# Altium PCB Copy of PCB.PcbDoc (part 1 of 5)
Units mm, origin at the board's own origin, x right, y up, seen from the top; angles counter-clockwise.
Board outline 130 x 115.04 mm, 6 copper layers (Top Layer, Int1 (GND), Int2, Int3 (PWR), Int4 (GND), Bottom Layer), stack 1.647 mm thick; 306 components, 246 nets, 1107 pads, 360 vias.
Unrouted connection lines stored in the file: 123.
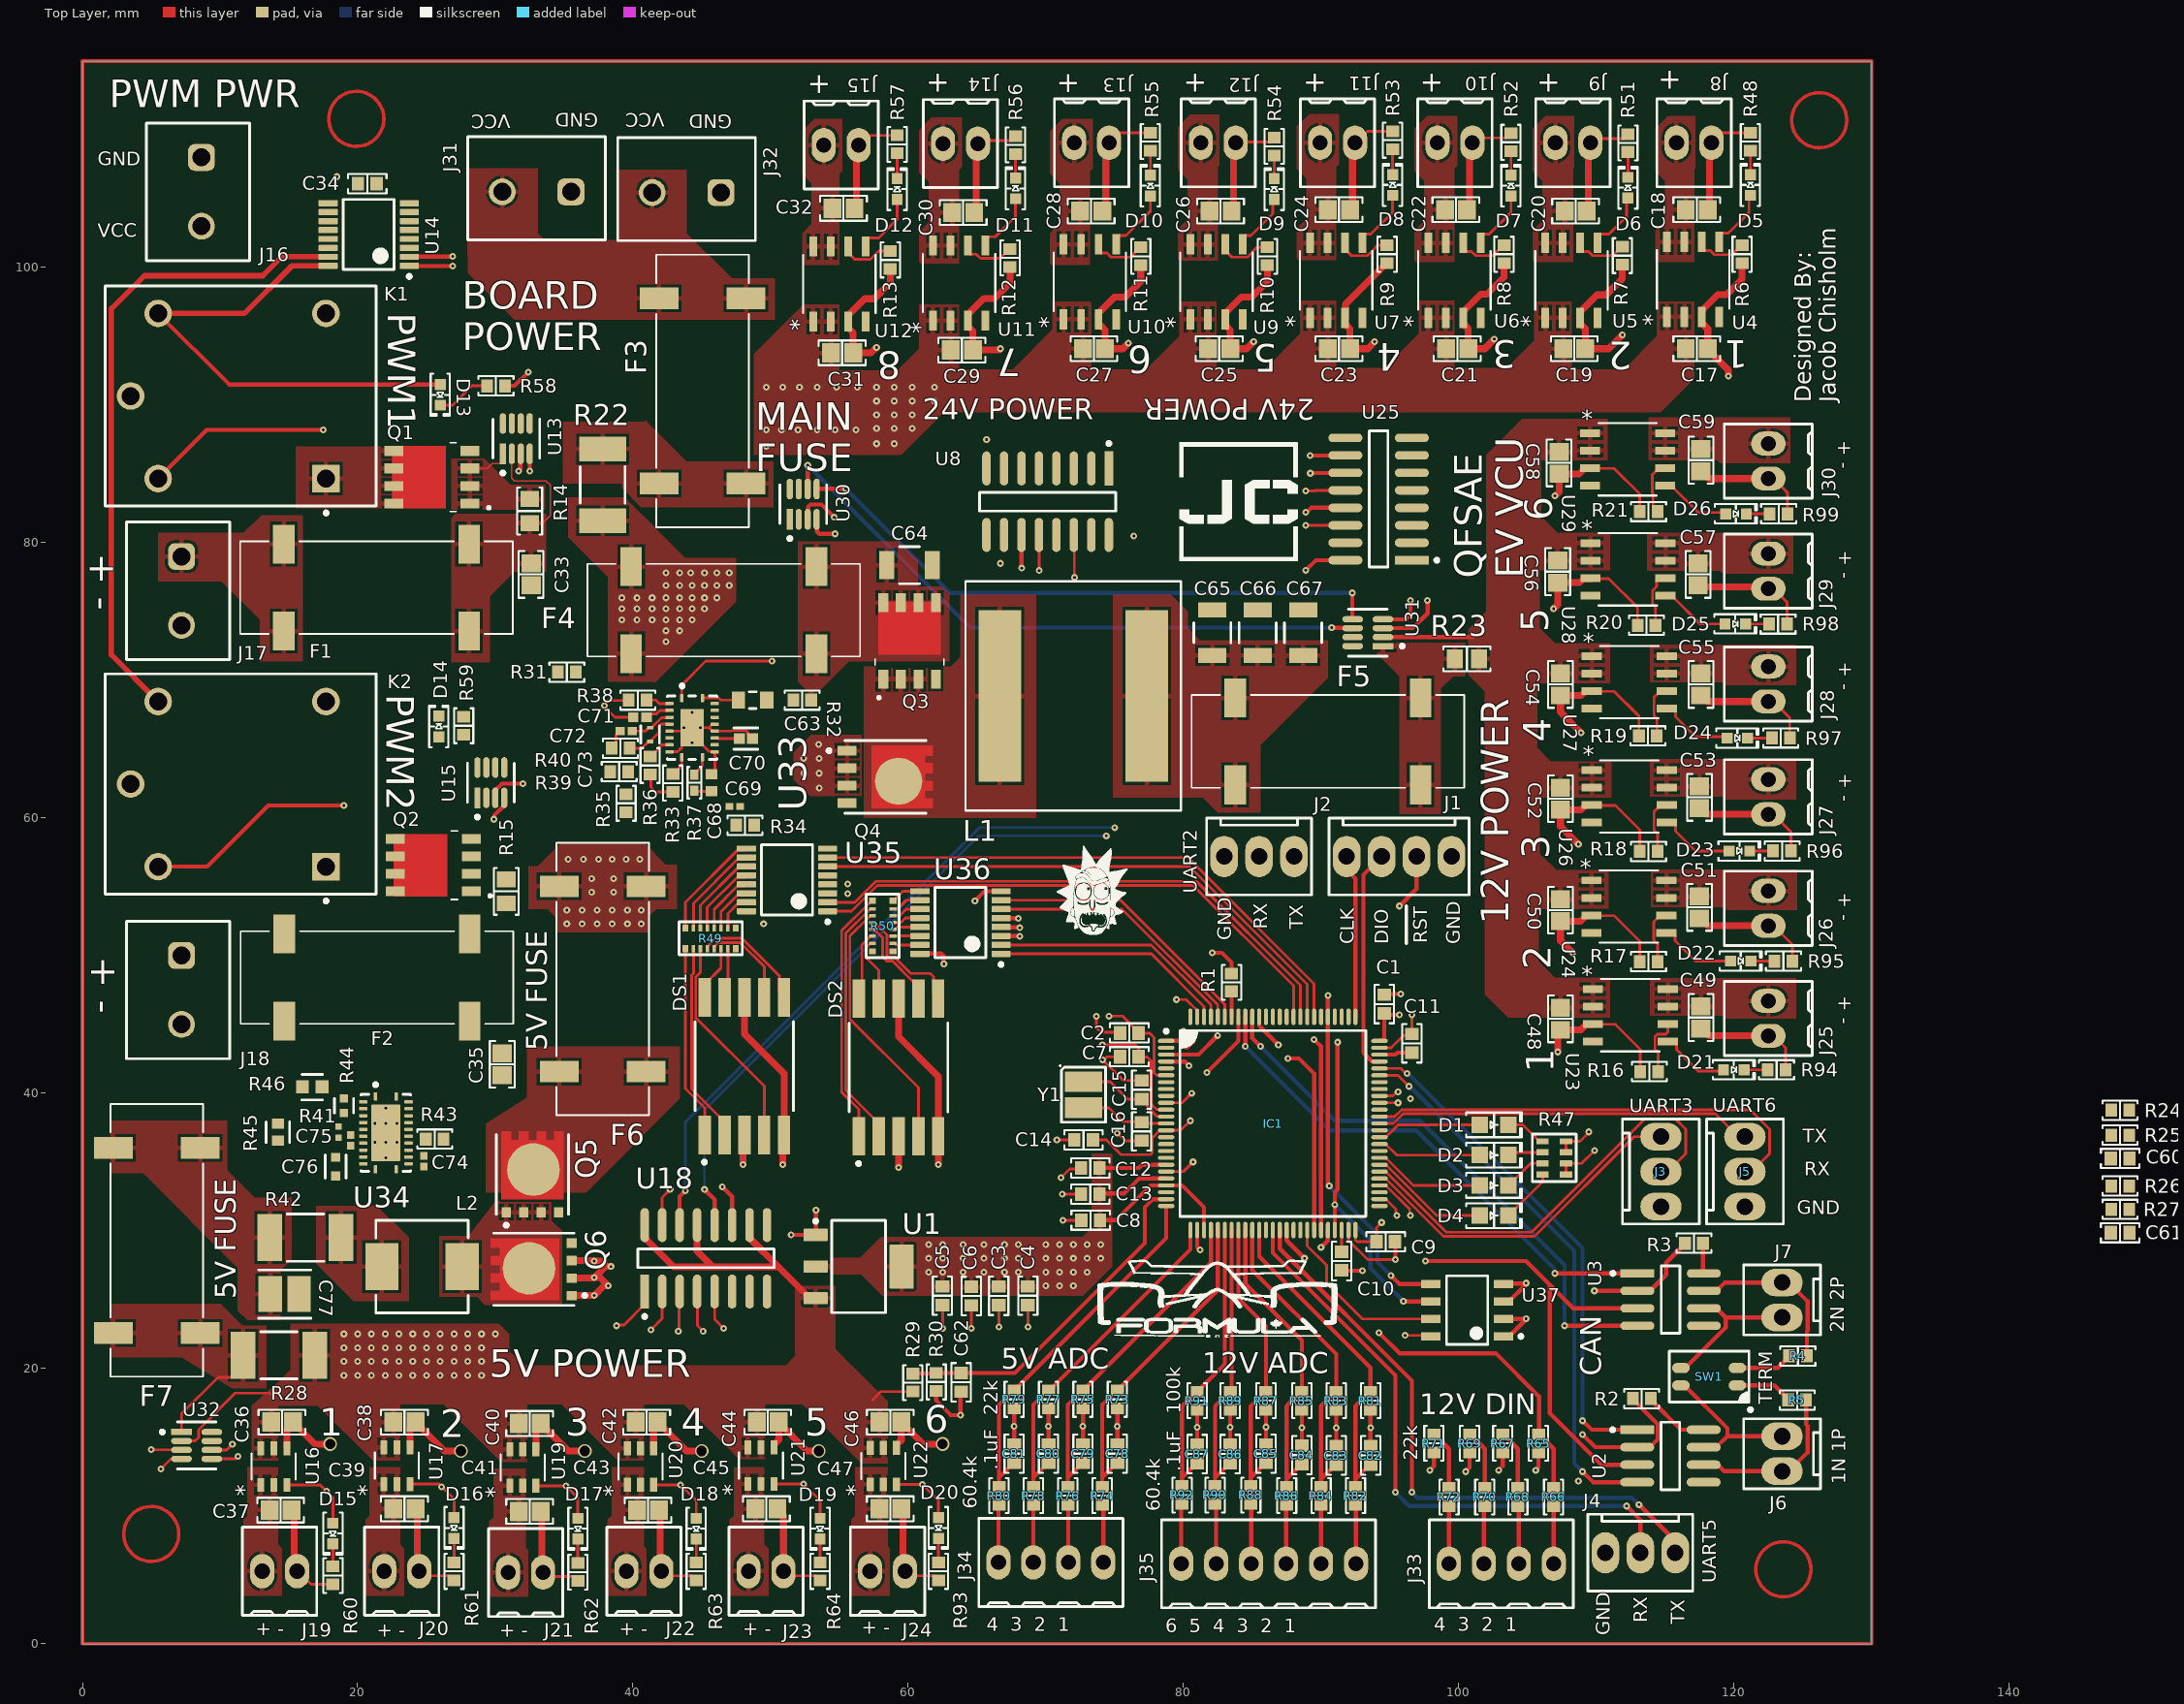
[diagram p0: Top Layer view]
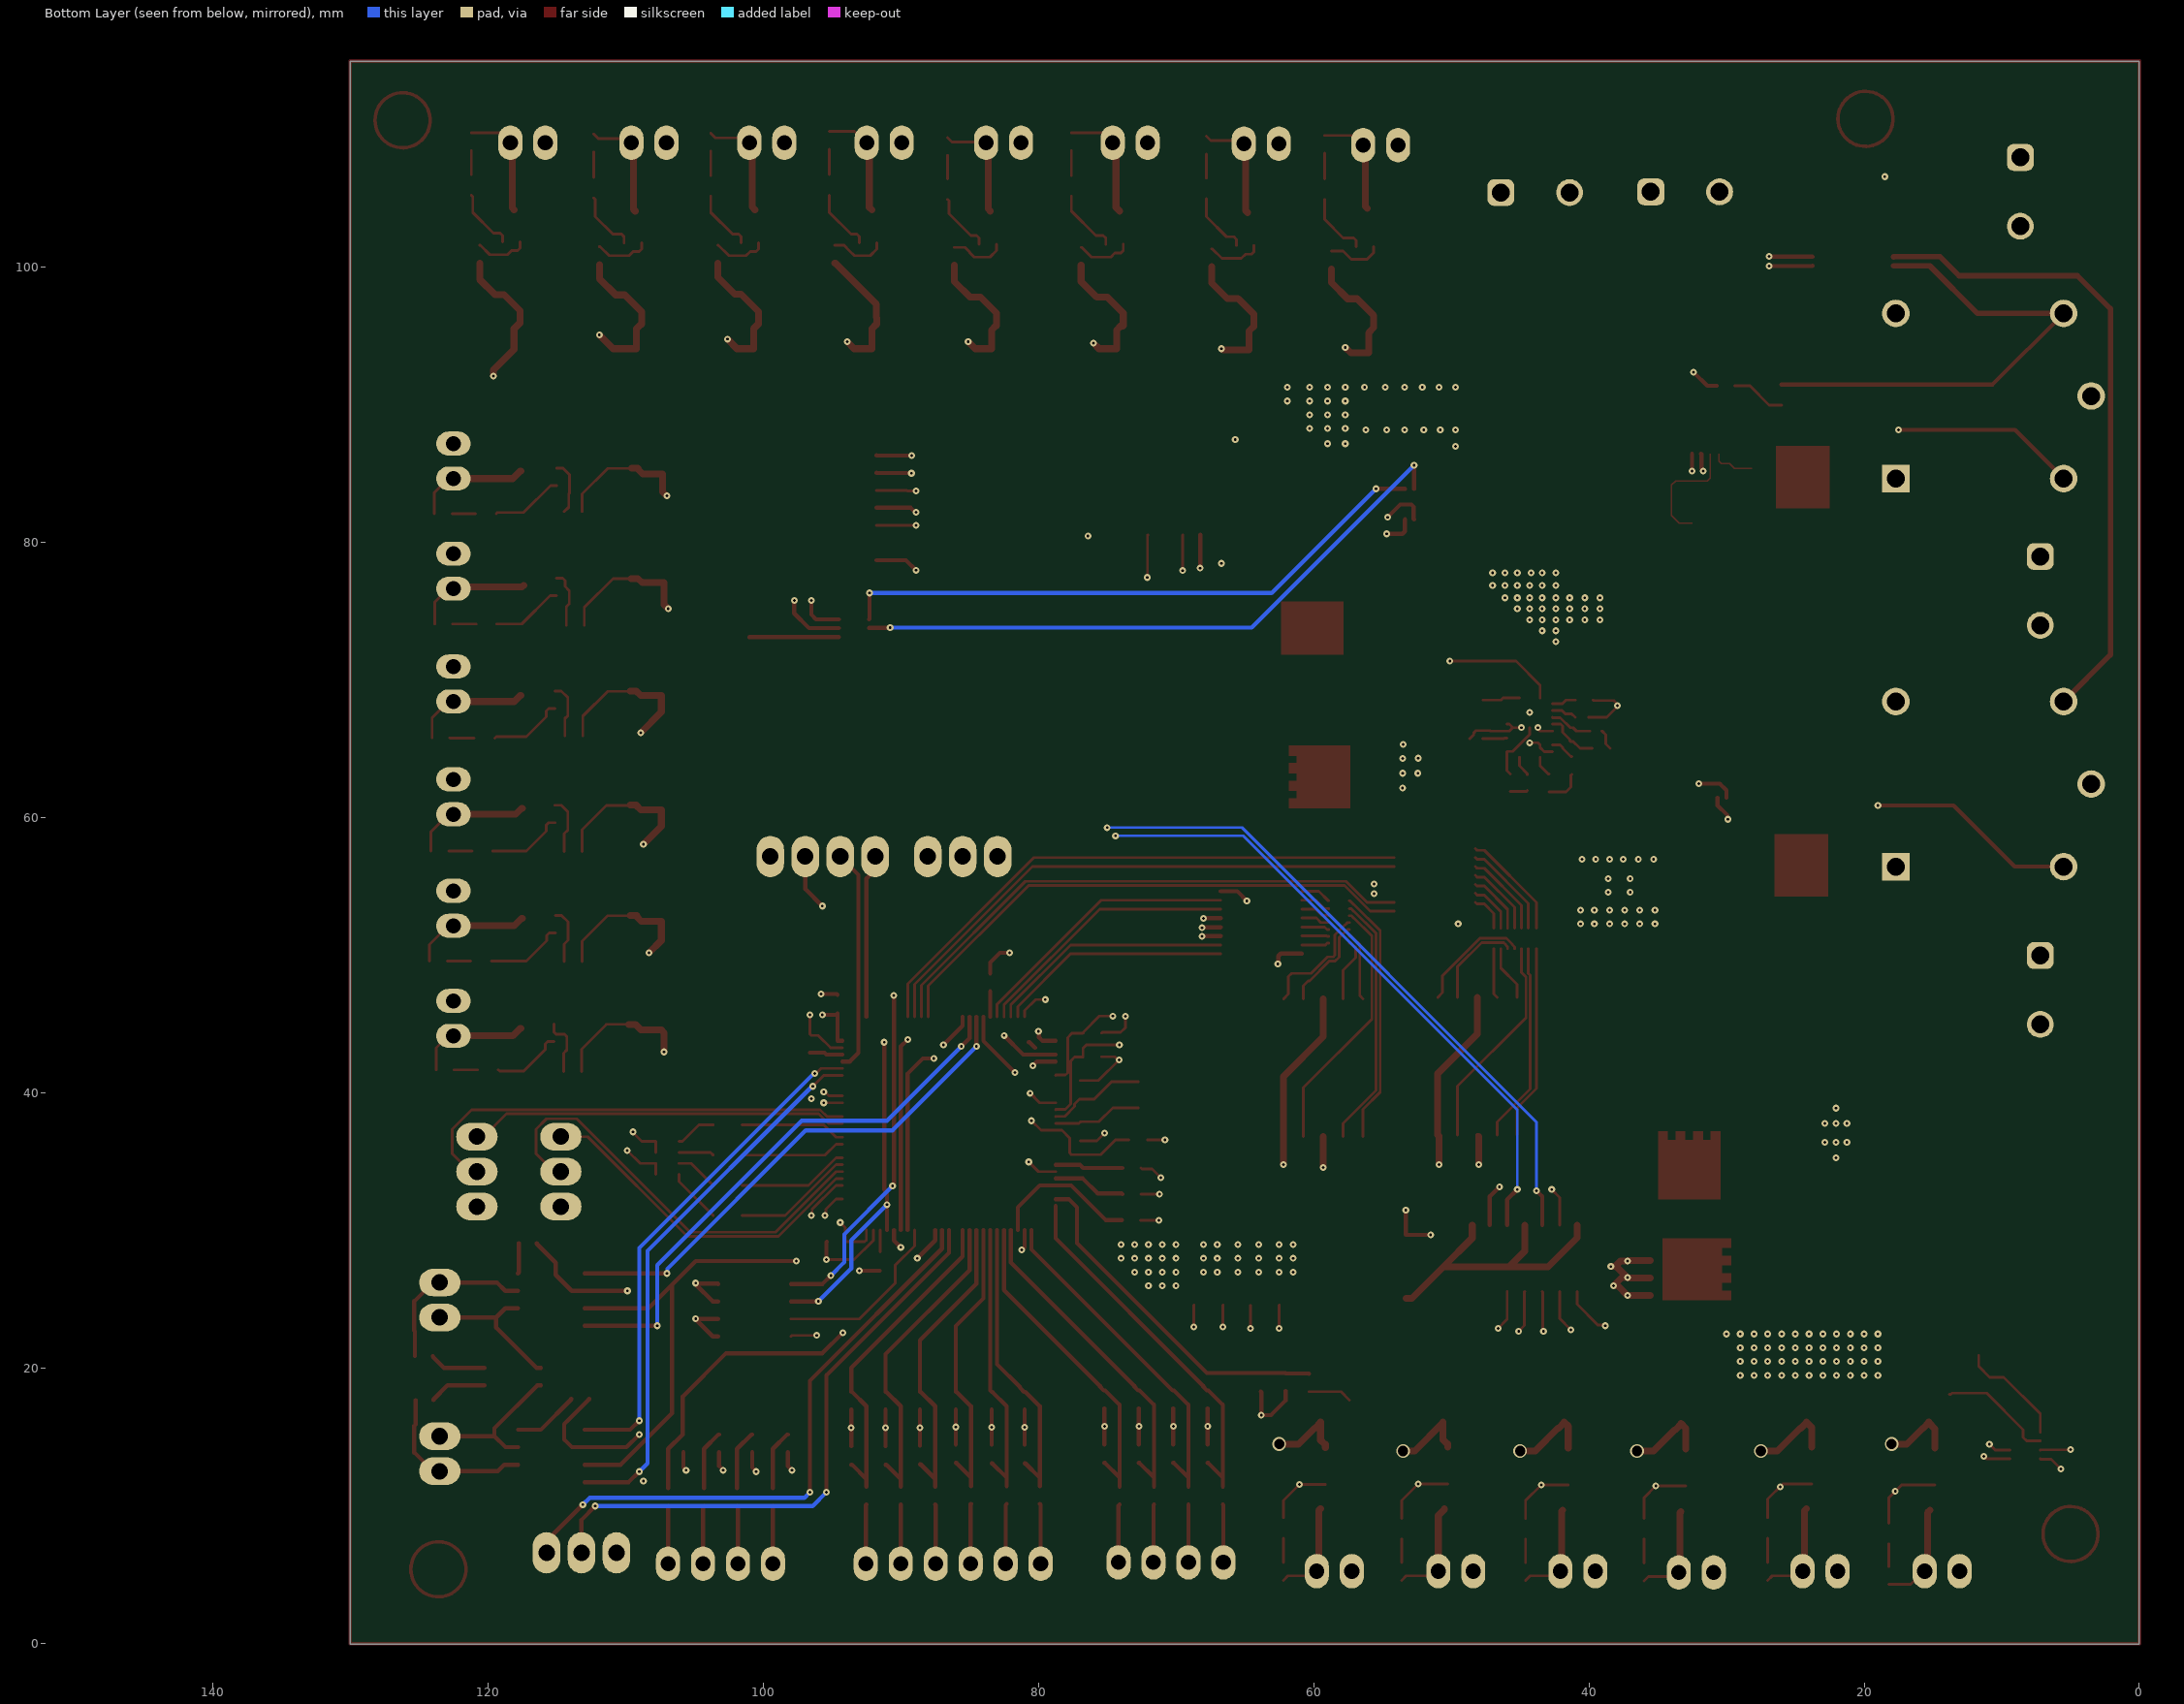
[diagram p1: Bottom Layer view, seen from below]
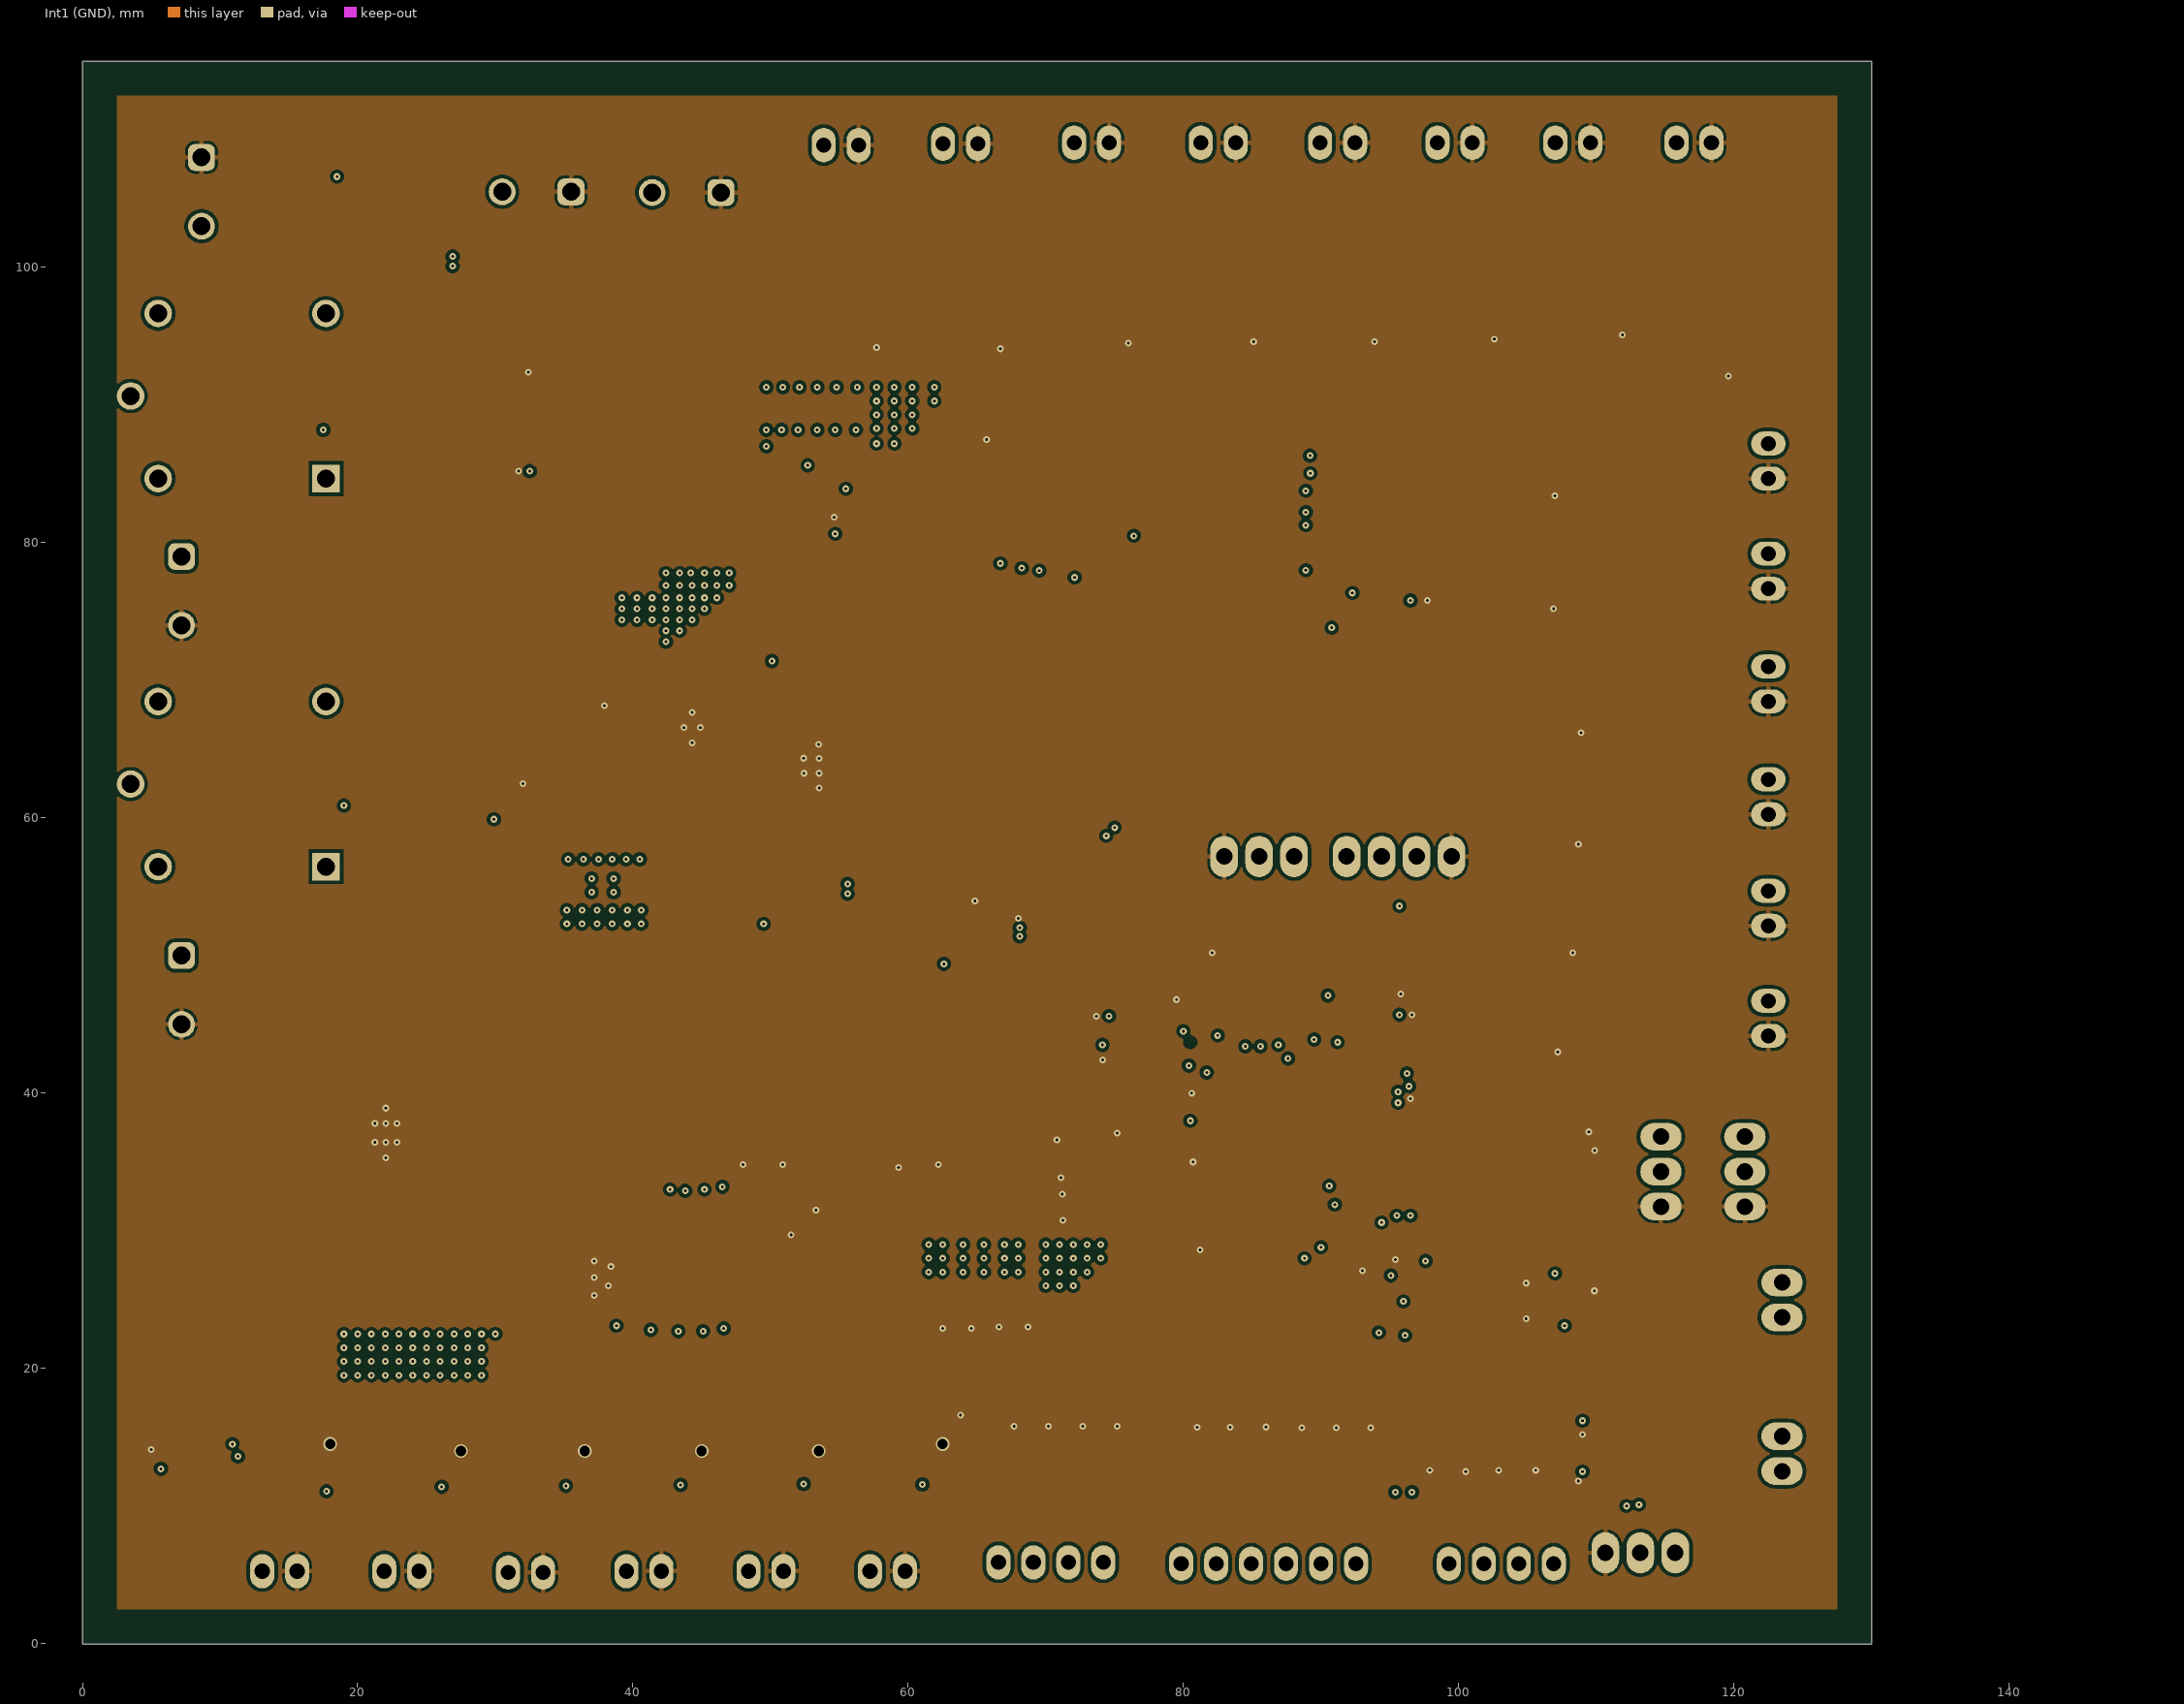
[diagram p2: Int1 (GND)]
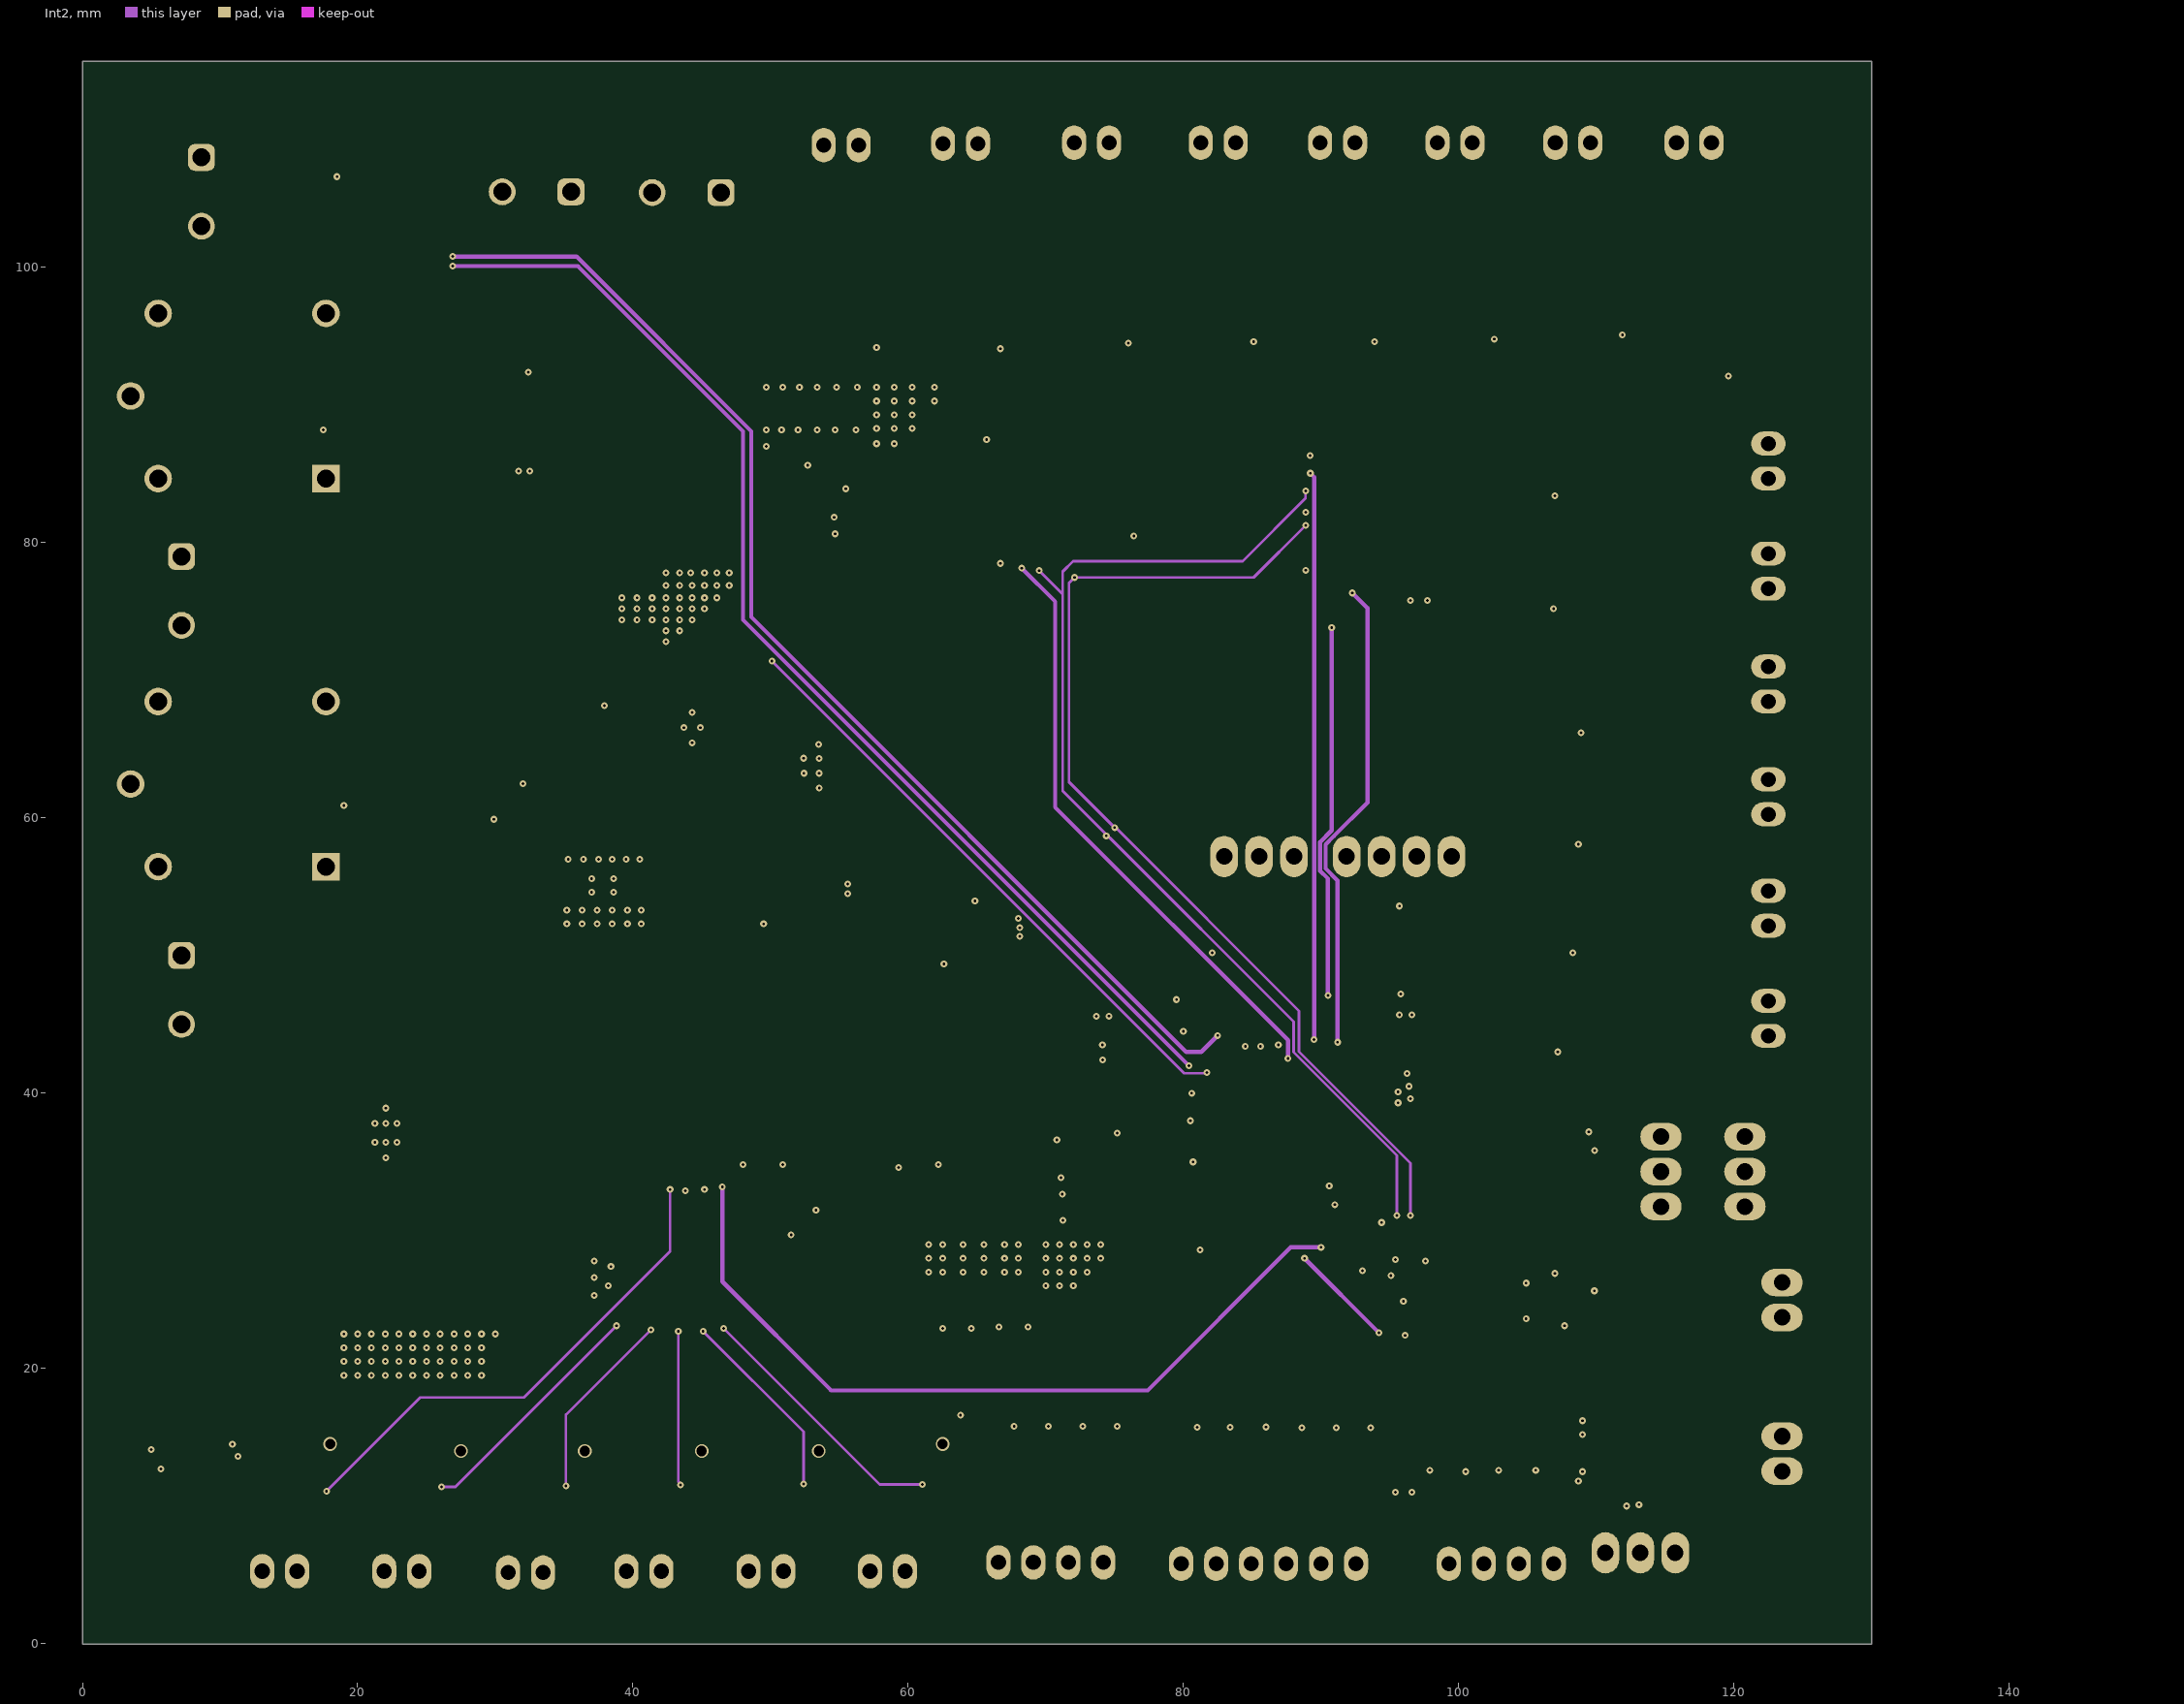
[diagram p3: Int2]
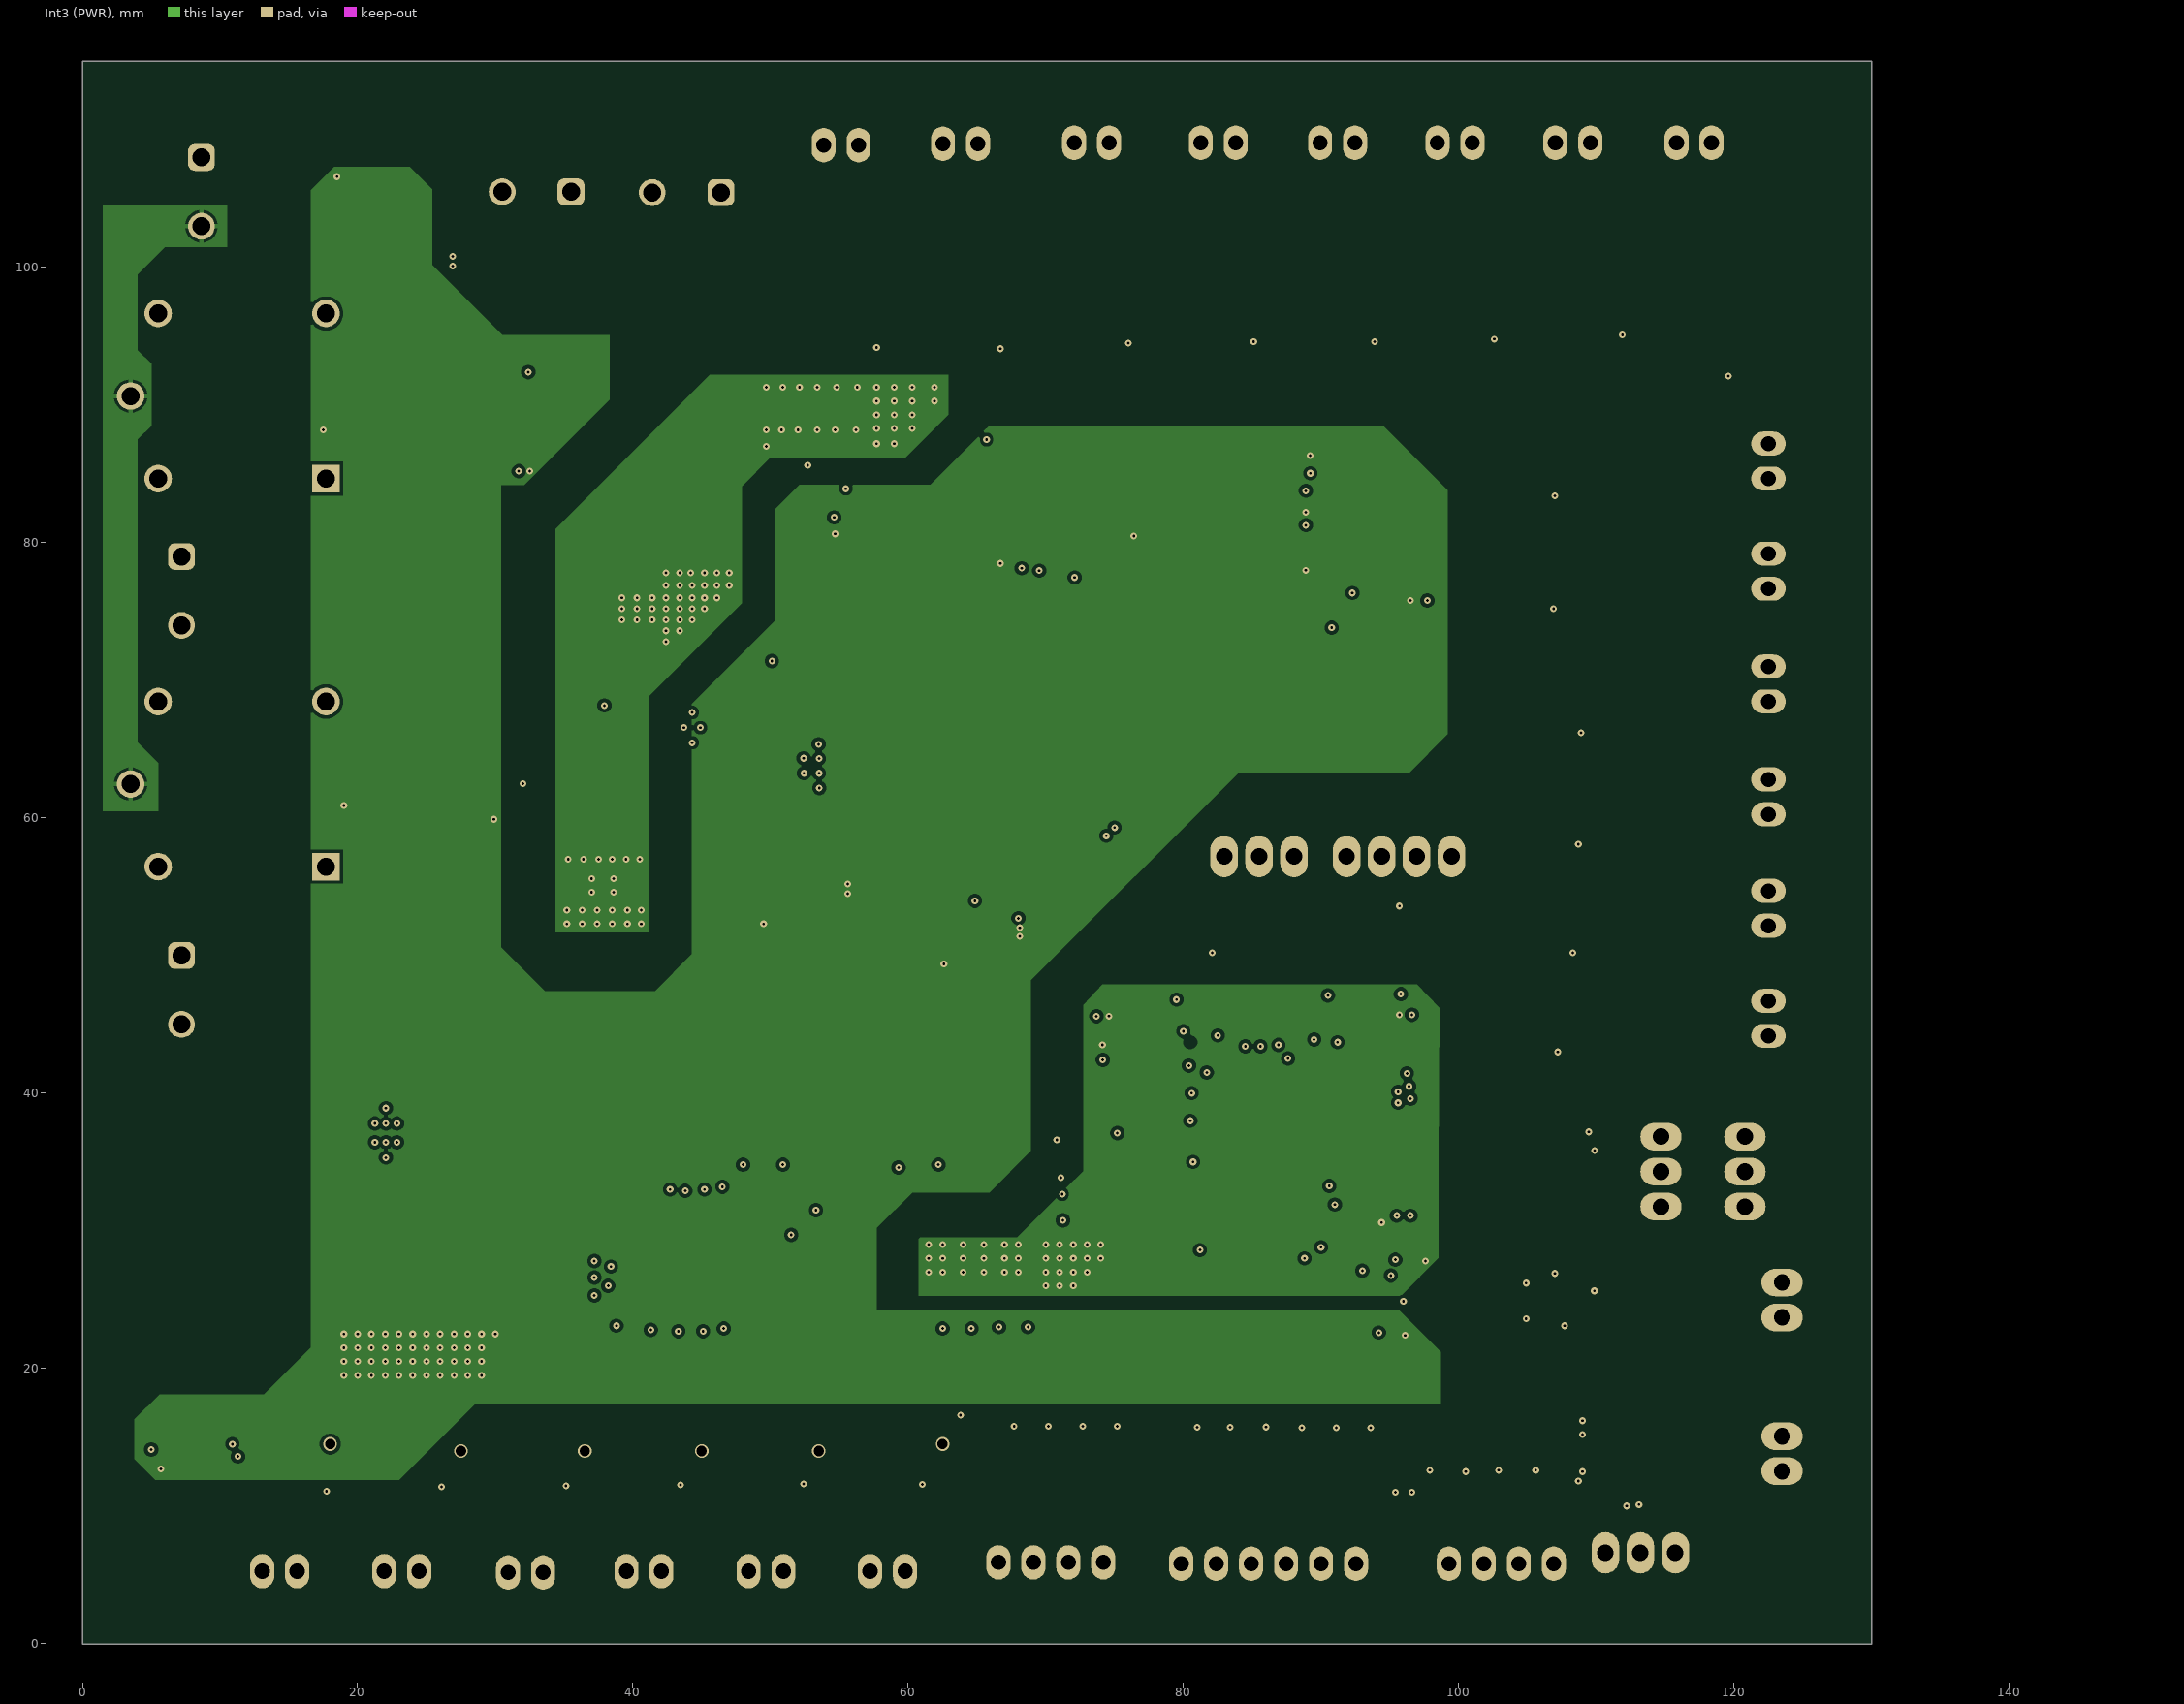
[diagram p4: Int3 (PWR)]
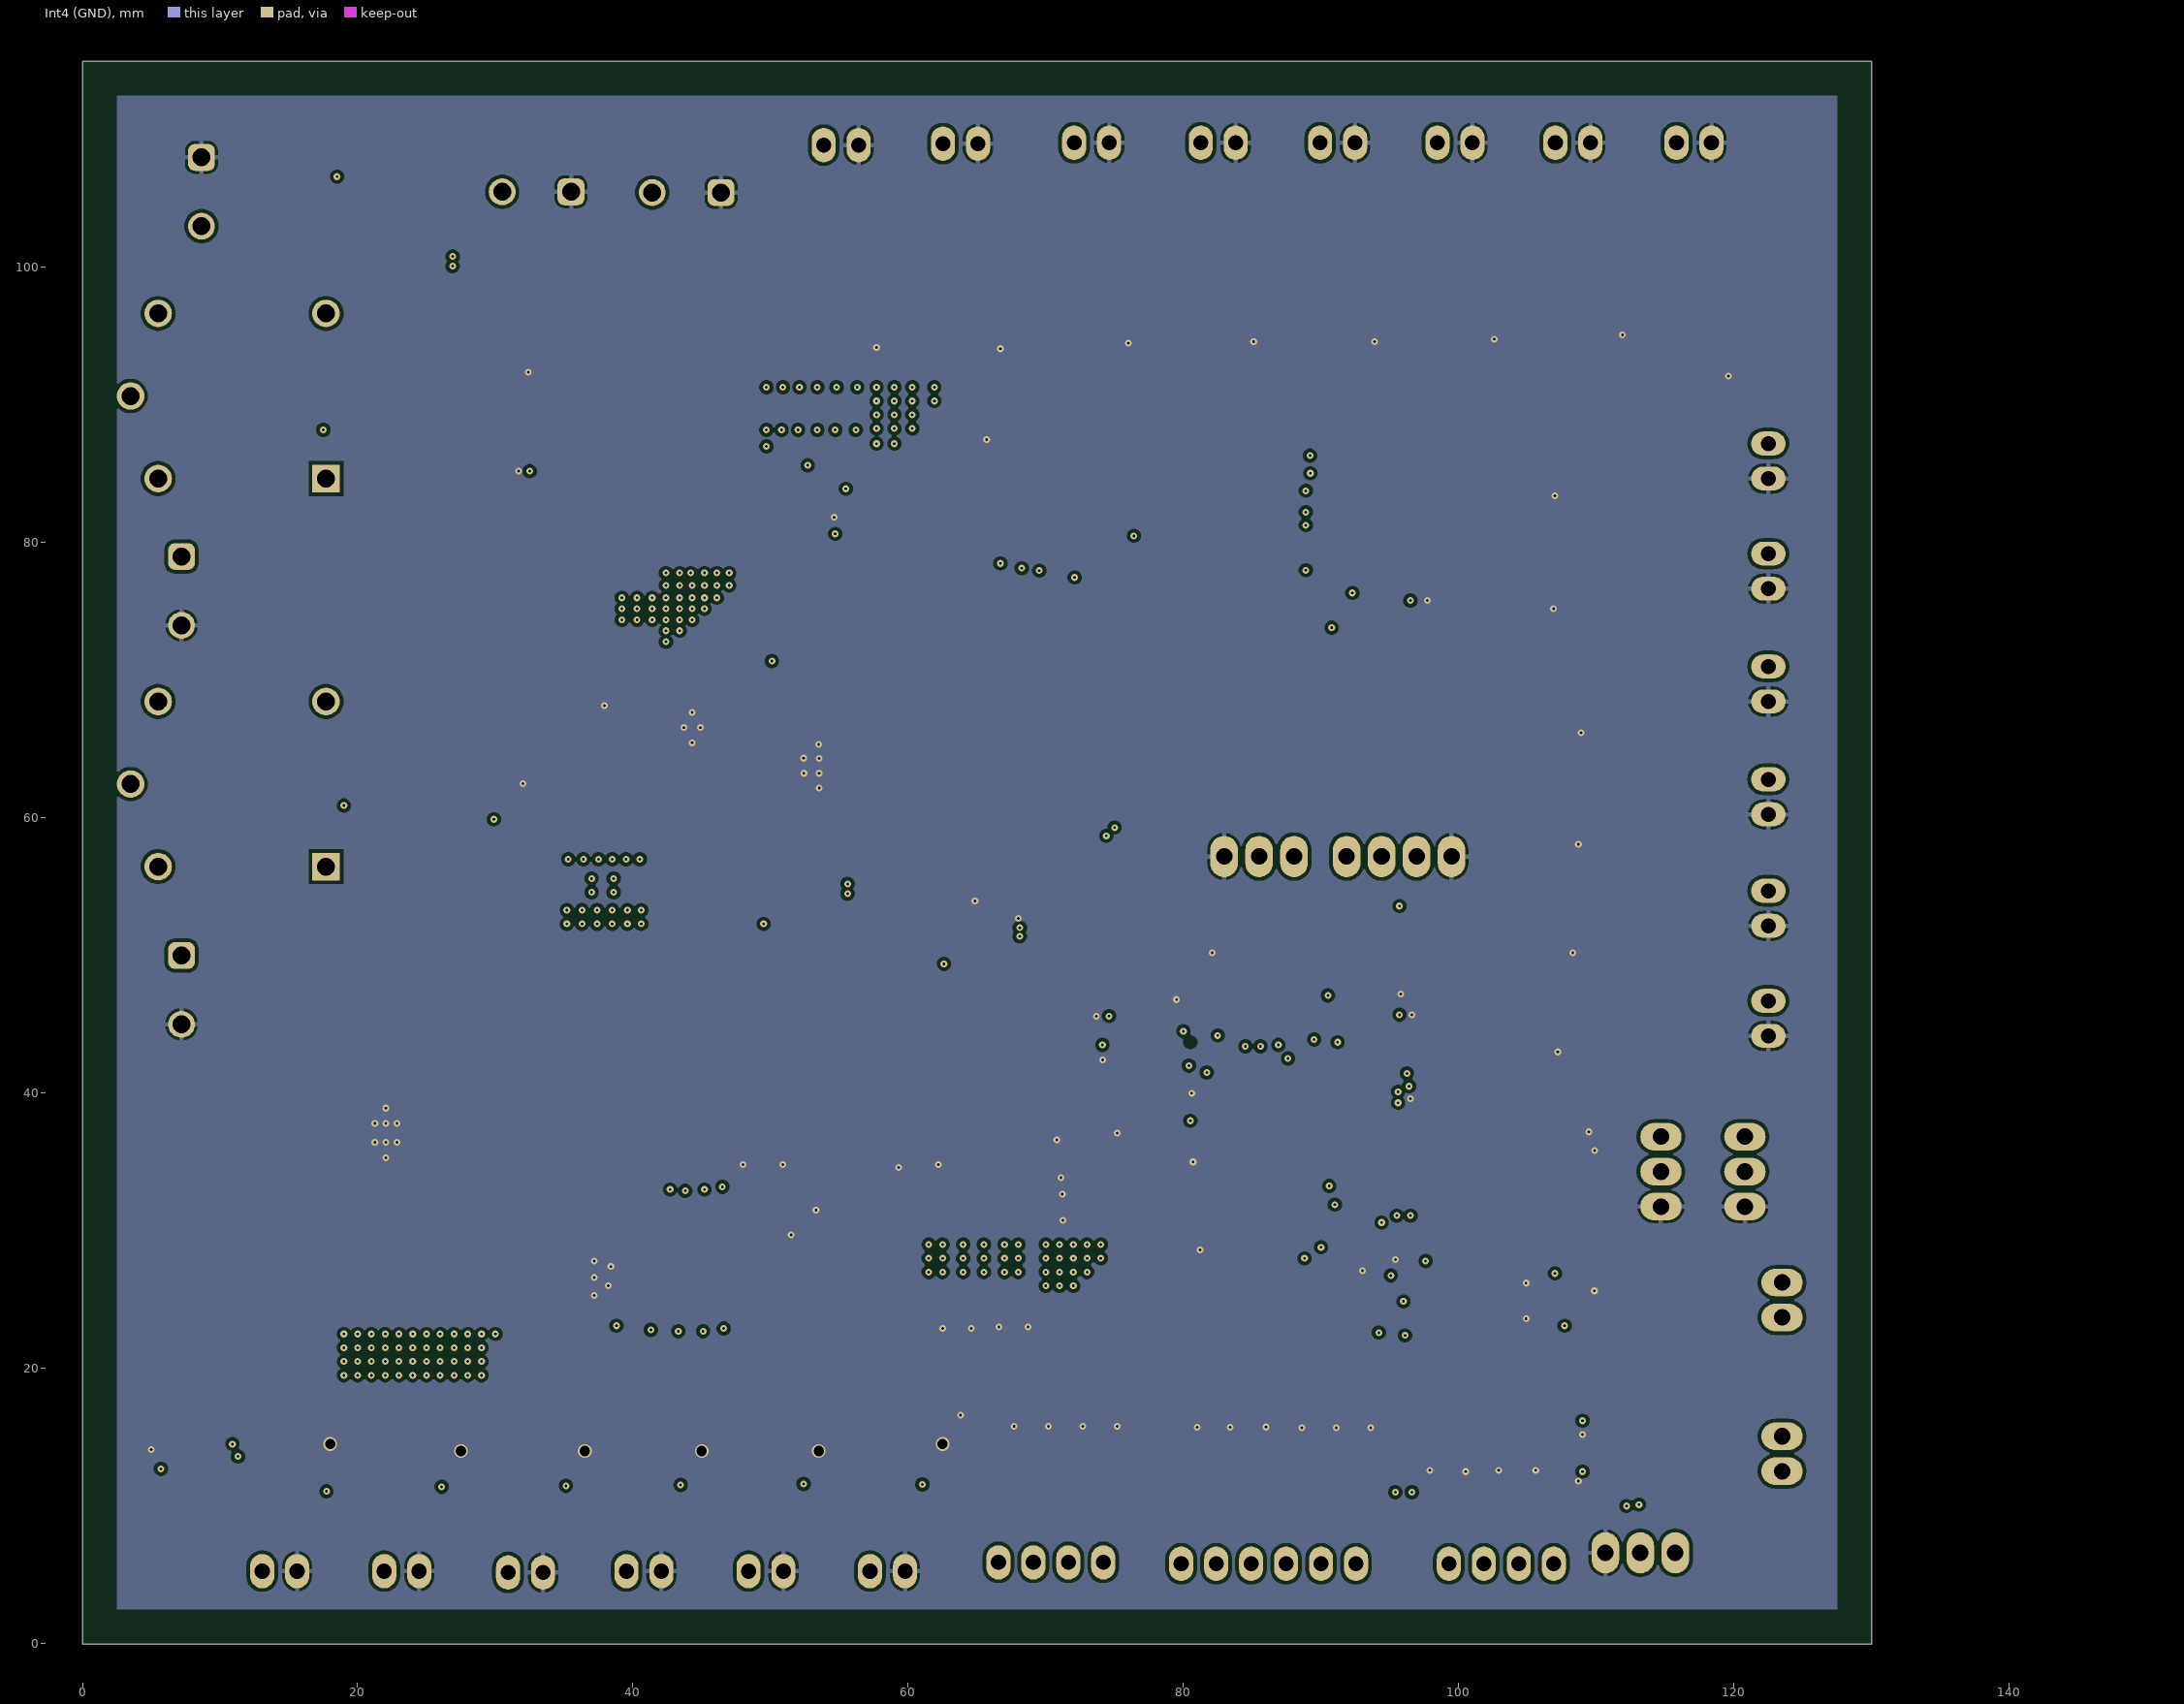
[diagram p5: Int4 (GND)]

## Layer stack, top to bottom
Top Solder: solder mask 0.0254, SM-001, Dk 4
Top Layer: signal copper 0.035
Dielectric 1: prepreg 0.0994, PP-006, Dk 4.1
Int1 (GND): signal copper 0.0152
Dielectric 3: core 0.55, Core-035, Dk 4.7
Int2: signal copper 0.0152
Dielectric 4: prepreg 0.1088, PP-006, Dk 4.1
Dielectric 5: prepreg 0.1088, PP-006, Dk 4.1
Int3 (PWR): signal copper 0.0152
Dielectric 6: core 0.55, Core-035, Dk 4.7
Int4 (GND): signal copper 0.0152
Dielectric 8: prepreg 0.0994, PP-006, Dk 4.1
Bottom Layer: signal copper 0.035
Bottom Solder: solder mask 0.0254, SM-001, Dk 4

## Board outline
0,-0.036 0,115 130,115 130,-0.036

## Design rules (kind name [scope] priority, off if disabled: settings)
Clearance Clearance_1 [(ExistsOnLayer('Int1') Or ExistsOnLayer('Int2')) vs (ExistsOnLayer('Int1') Or ExistsOnLayer('Int2'))] p1: gap=0.2 ignorepadtopadclearanceinfootprint=FALSE except(0: Arc-Hole Track-Hole SMDPad-Hole THPad-Hole Via-Hole Fill-Hole Poly-Hole Region-Hole Text-Hole; 0.1: Arc-Arc Arc-Track Arc-SMDPad Arc-Text Track-Track Track-SMDPad Track-Text SMDPad-SMDPad SMDPad-Text Text-Text; 0.254: Hole-Hole)
Clearance Clearance_2 [(ExistsOnLayer('Top Layer') Or ExistsOnLayer('Bottom Layer')) vs (ExistsOnLayer('Top Layer') Or ExistsOnLayer('Bottom Layer'))] p2: gap=0.2 ignorepadtopadclearanceinfootprint=FALSE except(0: Arc-Hole Track-Hole SMDPad-Hole THPad-Hole Via-Hole Fill-Hole Poly-Hole Region-Hole Text-Hole; 0.1: Arc-Arc Arc-Track Arc-SMDPad Arc-Text Track-Track Track-SMDPad Track-Text SMDPad-SMDPad SMDPad-Text Text-Text; 0.254: Hole-Hole)
Clearance Clearance_3 [(ExistsOnLayer('Int1') Or ExistsOnLayer('Int2')) vs (ExistsOnLayer('Int1') Or ExistsOnLayer('Int2'))] p3: gap=0.254 ignorepadtopadclearanceinfootprint=FALSE except(0: Arc-Hole Track-Hole SMDPad-Hole THPad-Hole Via-Hole Fill-Hole Poly-Hole Region-Hole Text-Hole)
Clearance Clearance_4 [(ExistsOnLayer('Top Layer') Or ExistsOnLayer('Bottom Layer')) vs (ExistsOnLayer('Top Layer') Or ExistsOnLayer('Bottom Layer'))] p4: gap=0.254 ignorepadtopadclearanceinfootprint=FALSE except(0: Arc-Hole Track-Hole SMDPad-Hole THPad-Hole Via-Hole Fill-Hole Poly-Hole Region-Hole Text-Hole)
Clearance [All] p5: gap=0.254 ignorepadtopadclearanceinfootprint=FALSE except(0: Arc-Hole Track-Hole SMDPad-Hole THPad-Hole Via-Hole Fill-Hole Poly-Hole Region-Hole Text-Hole)
MinimumSolderMaskSliver [All] p1: minsoldermaskwidth=0.127
PlaneConnect [All] p1: planeconnectstyle=Direct reliefexpansion=0.508 reliefentries=4 reliefconductorwidth=0.254 reliefairgap=0.254
PolygonConnect [All] p1: thpad.connectstyle=Relief thpad.reliefconductorwidth=0.35 thpad.reliefentries=4 thpad.polygonreliefangle="90 Angle" thpad.airgapwidth=0.2 smdpad.connectstyle=Relief smdpad.reliefconductorwidth=0.35 smdpad.reliefentries=4 smdpad.polygonreliefangle="90 Angle" smdpad.airgapwidth=0.2 via.connectstyle=Direct via.reliefconductorwidth=0.254 via.reliefentries=4 via.polygonreliefangle="90 Angle" via.airgapwidth=0.254
RoutingVias [All] p1: holewidth=0.254 width=0.5 viastyle="Through Hole" minholewidth=0.2 minwidth=0.3 maxholewidth=2 maxwidth=3
RoutingVias RoutingVias_1 [All] p2: holewidth=0.711 width=1.27 viastyle="Through Hole" minholewidth=0.711 minwidth=1.27 maxholewidth=0.711 maxwidth=1.27
SilkToSilkClearance [All] p1: silktosilkclearance=0.2
SilkToSolderMaskClearance [IsPad] p1: minsilkscreentomaskgap=0 clearancetoexposedcopper=TRUE
SolderMaskExpansion [All] p1: expansion=0.102 istentingtop=FALSE
UnRoutedNet [All] p1: checkbadconnections=TRUE
Width [All] p1: maxlimit=1 minlimit=0.1 preferedwidth=0.2 minimp=50.000000 maximp=50.000000 favimp=50.000000
Width Width_1 [All] p2: maxlimit=0.254 minlimit=0.254 preferedwidth=0.254
25 further rules are at their usual default settings.

## Classes and differential pairs
component class Designator: C33 C34 C35 D13 D14 F1 F2 J16 J17 J18 K1 K2 Q1 Q2 R14 R15 R58 R59 U13 U14 U15
component class "PWM IN": J33 R65 R66 R67 R68 R69 R70 R71 R72
component class Power: C60 C61 C62 F3 F4 F5 F6 F7 J31 J32 R22 R23 R24 R25 R26 R27 R28 R29 R30 U30 U31 U32
component class MCU: C1 C2 C3 C4 C5 C6 C7 C8 C9 C10 C11 C12 C13 C14 C15 C16 IC1 J1 J2 J3 J4 J5 R1 U1 Y1
component class Indicators: D1 D2 D3 D4 DS1 DS2 R47 R49 R50 U35 U36
component class EEPROM: U37
component class CAN: J6 J7 R2 R3 R4 R5 SW1 U2 U3
component class "Analog Inputs": C78 C79 C80 C81 C82 C83 C84 C85 C86 C87 J34 J35 R73 R74 R75 R76 R77 R78 R79 R80 R81 R82 R83 R84 R85 R86 R87 R88 R89 R90 R91 R92
component class "24V Load Switches": C17 C18 C19 C20 C21 C22 C23 C24 C25 C26 C27 C28 C29 C30 C31 C32 D5 D6 D7 D8 D9 D10 D11 D12 J8 J9 J10 J11 J12 J13 J14 J15 R6 R7 R8 R9 R10 R11 R12 R13 R48 R51 R52 R53 R54 R55 R56 R57 U4 U5 U6 U7 U8 U9 U10 U11 U12
component class "12V Regulator": C63 C64 C65 C66 C67 C68 C69 C70 C71 C72 C73 L1 Q3 Q4 R31 R32 R33 R34 R35 R36 R37 R38 R39 R40 U33
component class "12V Load Switches": C48 C49 C50 C51 C52 C53 C54 C55 C56 C57 C58 C59 D21 D22 D23 D24 D25 D26 J25 J26 J27 J28 J29 J30 R16 R17 R18 R19 R20 R21 R94 R95 R96 R97 R98 R99 U23 U24 U25 U26 U27 U28 U29
component class "5V Regulator": C74 C75 C76 C77 L2 Q5 Q6 R41 R42 R43 R44 R45 R46 U34
component class "5V Load Switches": C36 C37 C38 C39 C40 C41 C42 C43 C44 C45 C46 C47 D15 D16 D17 D18 D19 D20 J19 J20 J21 J22 J23 J24 R60 R61 R62 R63 R64 R93 U16 U17 U18 U19 U20 U21 U22

## Components (designator, comment, footprint, x,y, rotation, side; value= is the part's Value field where it differs from the comment)
C1 "0.1 µF" "CAP 0603_1608" 94.6,46.475 r270 top
C2 "0.1 µF" "CAP 0603_1608" 76.073,44.374 r0 top
C3 "0.1 µF" "CAP 0603_1608" 66.578,25.274 r90 top
C4 "0.1 µF" "CAP 0603_1608" 68.692,25.281 r90 top
C5 "0.1 µF" "CAP 0603_1608" 62.492,25.281 r90 top
C6 "0.1 µF" "CAP 0603_1608" 64.592,25.256 r90 top
C7 "0.1 µF" "CAP 0603_1608" 76.073,42.647 r0 top
C8 "0.1 µF" "CAP 0603_1608" 73.258,30.77 r0 top
C9 "10 µF" "CAP 0603_1608" 94.7,29.2 r180 top
C10 "4.7 µF" "CAP 0603_1608" 91.5,27.8 r270 top
C11 "4.7 µF" "CAP 0603_1608" 96.6,43.625 r90 top
C12 "0.1 µF" "CAP 0603_1608" 73.233,34.57 r0 top
C13 "0.1 µF" "CAP 0603_1608" 73.233,32.668 r0 top
C14 "0.1 µF" "CAP 0603_1608" 72.744,36.606 r0 top
C15 "0.8 pF" "CAP 0603_1608" 76.962,40.248 r270 top
C16 "0.8 pF" "CAP 0603_1608" 76.962,37.222 r90 top
C17 "1 µF" "CAP 0805_2012" 117.3,94.1 r0 top
C18 "1 µF" "CAP 0805_2012" 117.3,104.2 r180 top
C19 "1 µF" "CAP 0805_2012" 108.4,94.1 r0 top
C20 "1 µF" "CAP 0805_2012" 108.5,104.1 r180 top
C21 "1 µF" "CAP 0805_2012" 99.9,94.1 r0 top
C22 "1 µF" "CAP 0805_2012" 99.8,104.2 r180 top
C23 "1 µF" "CAP 0805_2012" 91.3,94.1 r0 top
C24 "1 µF" "CAP 0805_2012" 91.3,104.2 r180 top
C25 "1 µF" "CAP 0805_2012" 82.6,94.1 r0 top
C26 "1 µF" "CAP 0805_2012" 82.7,104.1 r180 top
C27 "1 µF" "CAP 0805_2012" 73.5,94.1 r0 top
C28 "1 µF" "CAP 0805_2012" 73.3,104.1 r180 top
C29 "1 µF" "CAP 0805_2012" 63.9,94 r180 top
C30 "1 µF" "CAP 0805_2012" 64,104 r180 top
C31 "1 µF" "CAP 0805_2012" 55.2,93.8 r180 top
C32 "1 µF" "CAP 0805_2012" 55.3,104.3 r180 top
C33 "1 µF" "CAP 0805_2012" 32.6,77.7 r90 top
C34 "0.1 µF" "CAP 0603_1608" 20.7,106.1 r180 top
C35 "1 µF" "CAP 0805_2012" 30.5,42.1 r90 top
C36 "1 µF" "CAP 0805_2012" 14.5,16.1 r180 top
C37 "1 µF" "CAP 0805_2012" 14.4,9.7 r180 top
C38 "1 µF" "CAP 0805_2012" 23.4,16.1 r180 top
C39 "1 µF" "CAP 0805_2012" 23.4,9.8 r180 top
C40 "1 µF" "CAP 0805_2012" 32.5,16 r180 top
C41 "1 µF" "CAP 0805_2012" 32.5,9.6 r180 top
C42 "1 µF" "CAP 0805_2012" 41,16.1 r180 top
C43 "1 µF" "CAP 0805_2012" 41.1,9.7 r180 top
C44 "1 µF" "CAP 0805_2012" 49.8,16.1 r180 top
C45 "1 µF" "CAP 0805_2012" 49.7,9.8 r180 top
C46 "1 µF" "CAP 0805_2012" 58.7,16.1 r180 top
C47 "1 µF" "CAP 0805_2012" 58.7,9.8 r180 top
C48 "1 µF" "CAP 0805_2012" 107.4,45.4 r270 top
C49 "1 µF" "CAP 0805_2012" 117.6,45.5 r90 top
C50 "1 µF" "CAP 0805_2012" 107.4,53.3 r270 top
C51 "1 µF" "CAP 0805_2012" 117.5,53.5 r90 top
C52 "1 µF" "CAP 0805_2012" 107.4,61.4 r270 top
C53 "1 µF" "CAP 0805_2012" 117.5,61.5 r90 top
C54 "1 µF" "CAP 0805_2012" 107.4,69.7 r270 top
C55 "1 µF" "CAP 0805_2012" 117.6,69.7 r90 top
C56 "1 µF" "CAP 0805_2012" 107.2,77.9 r270 top
C57 "1 µF" "CAP 0805_2012" 117.4,77.7 r90 top
C58 "1 µF" "CAP 0805_2012" 107.3,85.8 r270 top
C59 "1 µF" "CAP 0805_2012" 117.6,86 r90 top
C60 "0.1 µF" "CAP 0603_1608" 148.063,35.257 r0 top
C61 "0.1 µF" "CAP 0603_1608" 148.063,29.857 r0 top
C62 "0.1 µF" "CAP 0603_1608" 63.843,18.988 r90 top
C63 "CGA3E2X7R1H104K080AA" FP-CGA3E-0_3-0_1-IPC_A 48.7,68.564 r0 top
C64 "GRM32ER71H475KA88L" FP-GRM32-MFG 60.1,78.364 r180 top value=4.7uF
C65 "GRM32ER61E226KE15L" FP-GRM32-MFG 82.1,73.464 r270 top value=22uF
C66 "GRM32ER61E226KE15L" FP-GRM32-MFG 85.4,73.464 r270 top value=22uF
C67 "GRM32ER61E226KE15L" FP-GRM32-MFG 88.7,73.464 r270 top value=22uF
C68 "GRM1885C2A100JA01D" CAPC1608X90X35LL10T15 45.7,62.564 r270 top
C69 "GRM155R71H561KA01D" CAPC1005X55X25LL05T10 47.41,60.839 r0 top
C70 "C1005X5R1V225K050BC" FP-C1005-050-0_15-IPC_A 48.2,65.764 r0 top
C71 "GRM155R71C563KA88D" CAPC1005X55X25ML05T10 40.51,67.314 r0 top
C72 "GRM155R71C822KA01D" CAPC1005X55X25NL05T10 39.5,66.314 r180 top
C73 "CGA2B2X7R1H681K050BA" FP-CGA2B-IPC_C 41.25,66.064 r270 top
C74 "GRM155R71A104KA01D" CAPC1005X55X25LL05T10 24.8,35.064 r90 top
C75 "GRM155R71A104KA01D" CAPC1005X55X25LL05T10 19.5,36.564 r270 top
C76 "GRM188R71A225KE15D" FP-GRM188-0_1-e0_2_0_5-MFG 18.4,34.664 r90 top
C77 "GRM32ER61C476KE15L" FP-GRM32E-0_3-0_2-IPC_C 14.7,25.4 r0 top
C78 "0.1 µF" "CAP 0603_1608" 75.2,13.8 r90 top
C79 "0.1 µF" "CAP 0603_1608" 72.7,13.8 r90 top
C80 "0.1 µF" "CAP 0603_1608" 70.2,13.8 r90 top
C81 "0.1 µF" "CAP 0603_1608" 67.7,13.8 r90 top
C82 "0.1 µF" "CAP 0603_1608" 93.6,13.675 r90 top
C83 "0.1 µF" "CAP 0603_1608" 91.1,13.675 r90 top
C84 "0.1 µF" "CAP 0603_1608" 88.6,13.7 r90 top
C85 "0.1 µF" "CAP 0603_1608" 86,13.8 r90 top
C86 "0.1 µF" "CAP 0603_1608" 83.4,13.775 r90 top
C87 "0.1 µF" "CAP 0603_1608" 81,13.775 r90 top
D1 "Red" "LED 0805_2012 RED" 102.573,37.7 r0 top
D2 "Yellow" "LED 0805_2012 YELLOW" 102.573,35.5 r0 top
D3 "Green" "LED 0805_2012 GREEN" 102.573,33.3 r0 top
D4 "Blue" "LED 0805_2012 BLUE" 102.573,31.1 r0 top
D5 "Red" "LED 0603_1608 RED" 121.2,106 r90 top
D6 "Red" "LED 0603_1608 RED" 112.3,105.8 r90 top
D7 "Red" "LED 0603_1608 RED" 103.8,105.95 r90 top
D8 "Red" "LED 0603_1608 RED" 95.2,106 r90 top
D9 "Red" "LED 0603_1608 RED" 86.6,105.7 r90 top
D10 "Red" "LED 0603_1608 RED" 77.6,105.95 r90 top
D11 "Red" "LED 0603_1608 RED" 67.8,105.75 r90 top
D12 "Red" "LED 0603_1608 RED" 59.2,105.7 r90 top
D13 "Red" "LED 0603_1608 RED" 26,90.75 r270 top
D14 "Red" "LED 0603_1608 RED" 25.9,66.65 r90 top
D15 "Red" "LED 0603_1608 RED" 18.2,8 r270 top
D16 "Red" "LED 0603_1608 RED" 27,8.4 r270 top
D17 "Red" "LED 0603_1608 RED" 36,8.35 r270 top
D18 "Red" "LED 0603_1608 RED" 44.6,8.35 r270 top
D19 "Red" "LED 0603_1608 RED" 53.6,8.35 r270 top
D20 "Red" "LED 0603_1608 RED" 62.2,8.4 r270 top
D21 "Red" "LED 0603_1608 RED" 120,41.7 r0 top
D22 "Red" "LED 0603_1608 RED" 120.5,49.6 r0 top
D23 "Red" "LED 0603_1608 RED" 120.4,57.6 r0 top
D24 "Red" "LED 0603_1608 RED" 120.25,65.8 r0 top
D25 "Red" "LED 0603_1608 RED" 120.1,74.1 r0 top
D26 "Red" "LED 0603_1608 RED" 120.15,82.1 r0 top
DS1 "ACSC02-41SURKWA-F01" FP-ACSC02-41SURKWA-F01-MFG 48.1,41.964 r90 top
DS2 "ACSC02-41SURKWA-F01" FP-ACSC02-41SURKWA-F01-MFG 59.3,41.864 r90 top
F1 "" FUSE_3587-10TR 21.37,76.74 r180 top
F2 "" FUSE_3587-10TR 21.4,48.4 r180 top
F3 "" FUSE_3587-10TR 45.06,91.03 r270 top
F4 "" FUSE_3587-10TR 46.6,75.1 r0 top
F5 "" FUSE_3587-10TR 90.5,65.564 r0 top
F6 "" FUSE_3587-10TR 37.8,48.3 r270 top
F7 "" FUSE_3587-10TR 5.4,29.3 r270 top
IC1 "STM32F446VET6" "ST LQFP-100 14X14MM" 86.5,37.8 r0 top
J1 "0022272041" "MOLEX KK 0022272041" 95.67,57.2 r180 top
J2 "0022272031" "MOLEX KK 0022272031" 85.5,57.2 r180 top
J3 "0022272031" "MOLEX KK 0022272031" 114.7,34.3 r270 top
J4 "0022272031" "MOLEX KK 0022272031" 113.2,6.6 r180 top
J5 "0022272031" "MOLEX KK 0022272031" 120.8,34.3 r270 top
J6 "0022272021" "MOLEX KK 0022272021" 123.5,13.8 r90 top
J7 "0022272021" "MOLEX KK 0022272021" 123.5,24.97 r90 top
J8 "282834-2" "TE 282834-2" 117.1,109.064 r0 top
J9 "282834-2" "TE 282834-2" 108.3,109.064 r0 top
J10 "282834-2" "TE 282834-2" 99.73,109.064 r0 top
J11 "282834-2" "TE 282834-2" 91.2,109.064 r0 top
J12 "282834-2" "TE 282834-2" 82.53,109.064 r0 top
J13 "282834-2" "TE 282834-2" 73.33,109.064 r0 top
J14 "282834-2" "TE 282834-2" 63.8,109 r0 top
J15 "282834-2" "TE 282834-2" 55.13,108.9 r0 top
J16 "691137710002" 691137710002 8.4,105.5 r270 top
J17 "691137710002" 691137710002 6.95,76.5 r270 top
J18 "691137710002" 691137710002 6.95,47.5 r270 top
J19 "282834-2" "TE 282834-2" 14.33,5.264 r180 top
J20 "282834-2" "TE 282834-2" 23.2,5.264 r180 top
J21 "282834-2" "TE 282834-2" 32.2,5.164 r180 top
J22 "282834-2" "TE 282834-2" 40.8,5.264 r180 top
J23 "282834-2" "TE 282834-2" 49.67,5.264 r180 top
J24 "282834-2" "TE 282834-2" 58.5,5.264 r180 top
J25 "282834-2" "TE 282834-2" 122.5,45.434 r270 top
J26 "282834-2" "TE 282834-2" 122.5,53.434 r270 top
J27 "282834-2" "TE 282834-2" 122.5,61.534 r270 top
J28 "282834-2" "TE 282834-2" 122.5,69.734 r270 top
J29 "282834-2" "TE 282834-2" 122.5,77.934 r270 top
J30 "282834-2" "TE 282834-2" 122.5,85.934 r270 top
J31 "691137710002" 691137710002 33,105.75 r180 top
J32 "691137710002" 691137710002 43.9,105.7 r180 top
J33 "282834-4" "TE 282834-4" 103.1,5.8 r180 top
J34 "282834-4" "TE 282834-4" 70.37,5.9 r180 top
J35 "282834-6" "TE 282834-6" 86.19,5.8 r180 top
K1 "1-1721150-0" FP-1-1721150-0-MFG 11.5,90.664 r180 top
K2 "1-1721150-0" FP-1-1721150-0-MFG 11.5,62.464 r180 top
L1 "XAL1580-302MED" IND_XAL1580-302MED_COC 72,68.864 r180 top
L2 "IHLP2525CZERR47M01" FP-IHLP-2525CZ-FP_2_413x3-MFG 24.679,27.4 r180 top
Q1 "CSD18540Q5B" TRANS_CSD18540Q5B 25.4,84.764 r180 top
Q2 "CSD18540Q5B" TRANS_CSD18540Q5B 25.5,56.564 r180 top
Q3 "CSD18540Q5B" TRANS_CSD18540Q5B 60.1,72.864 r90 top
Q4 "CSD18509Q5BT" FP-DNK0008A-MFG 58.342,62.982 r0 top
Q5 "CSD18534Q5A" FP-DQJ0008A-MFG 32.7,34.1 r90 top
Q6 "CSD18514Q5A" FP-DQJ0008A-MFG 32.8,27.2 r180 top
R1 "10 kOhms" "RES 0603_1608" 83.5,48.05 r90 top
R2 "10 kOhms" "RES 0603_1608" 113.3,17.8 r0 top
R3 "10 kOhms" "RES 0603_1608" 117.1,29.1 r0 top
R4 "120 Ohms" "RES 0603_1608" 124.65,20.9 r180 top
R5 "120 Ohms" "RES 0603_1608" 124.6,17.7 r0 top
R6 "64.9 kOhms" "RES 0603_1608" 120.6,100.964 r90 top
R7 "64.9 kOhms" "RES 0603_1608" 111.9,100.864 r90 top
R8 "64.9 kOhms" "RES 0603_1608" 103.3,100.964 r90 top
R9 "64.9 kOhms" "RES 0603_1608" 94.8,100.964 r90 top
R10 "64.9 kOhms" "RES 0603_1608" 86.1,100.814 r90 top
R11 "64.9 kOhms" "RES 0603_1608" 76.9,100.814 r90 top
R12 "64.9 kOhms" "RES 0603_1608" 67.4,100.7 r90 top
R13 "64.9 kOhms" "RES 0603_1608" 58.7,100.55 r90 top
R14 "6 mOhms" "RES 0805_2012" 32.5,82.3 r270 top
R15 "6 mOhms" "RES 0805_2012" 30.8,54.664 r270 top
R16 "64.9 kOhms" "RES 0603_1608" 113.85,41.564 r0 top
R17 "64.9 kOhms" "RES 0603_1608" 113.8,49.564 r0 top
R18 "64.9 kOhms" "RES 0603_1608" 113.8,57.564 r0 top
R19 "64.9 kOhms" "RES 0603_1608" 113.75,65.964 r0 top
R20 "100 kOhms" "RES 0603_1608" 113.65,74 r0 top
R21 "100 kOhms" "RES 0603_1608" 113.8,82.264 r0 top
R22 "CSS2H-2512R-L500F" FP-CSS2H-2512-MFG 37.8,84.2 r270 top
R23 "2 mOhms" "RES 0805_2012" 100.6,71.564 r0 top
R24 "200 kOhms" "RES 0603_1608" 148.063,38.757 r0 top
R25 "25.5 kOhms" "RES 0603_1608" 148.063,36.957 r180 top
R26 "100 kOhms" "RES 0603_1608" 148.063,33.257 r0 top
R27 "35.7 kOhms" "RES 0603_1608" 148.063,31.557 r180 top
R28 "PU2512FKM130R005L" FP-PU2512-0R005-MFG 14.275,20.955 r0 top value=5mΩ
R29 "20 kOhms" "RES 0603_1608" 60.343,18.963 r90 top
R30 "35.7 kOhms" "RES 0603_1608" 62.043,19.013 r270 top
R31 "10 kOhms" "RES 0603_1608" 35.2,70.6 r180 top
R32 "2.1 Ohms" "RES 0603_1608" 52.3,68.564 r0 top
R33 "20 kOhms" "RES 0603_1608" 42.9,62.539 r90 top
R34 "36.5 Ohms" "RES 0603_1608" 48.15,59.464 r180 top
R35 "18 kOhms" "RES 0603_1608" 39.5,61.064 r270 top
R36 "20 kOhms" "RES 0603_1608" 41.25,63.814 r90 top
R37 "681 Ohms" "RES 0402_1005" 44.475,62.564 r270 top
R38 "39.2 kOhms" "RES 0603_1608" 40.35,68.564 r0 top
R39 "1.27 kOhms" "RES 0603_1608" 39,63.364 r0 top
R40 "1.82 kOhms" "RES 0603_1608" 39.1,65.064 r0 top
R41 "CRCW040224K3FKED" RESC1005X40X25LL05T05 18.6,37.164 r270 top
R42 "PU2512FKM130R005L" FP-PU2512-0R005-MFG 16.2,29.5 r180 top value=5mΩ
R43 "100 kOhms" "RES 0603_1608" 25.6,36.664 r180 top
R44 "CRCW04029K53FKED" FP-CRCW0402-e3-MFG 19,39.089 r270 top
R45 "CRCW0603100KFKEA" FP-CRCW0603-e3-IPC_C 14.2,37.164 r90 top
R46 "CRCW060340K2FKEA" FP-CRCW0603-e3-IPC_B 16.7,40.464 r0 top
R47 "RAVF164DJT220R" "RESNET 1206-8 CONVEX" 106.95,35.3 r0 top
R48 "200 Ohms" "RES 0603_1608" 121.2,109.15 r90 top
R49 "RAVF168DJT220R" "RESNET 1506-16 CONVEX" 45.65,51.25 r270 top
R50 "RAVF168DJT220R" "RESNET 1506-16 CONVEX" 58.15,52.15 r180 top
R51 "200 Ohms" "RES 0603_1608" 112.3,109.05 r90 top
R52 "200 Ohms" "RES 0603_1608" 103.8,109.1 r90 top
R53 "200 Ohms" "RES 0603_1608" 95.2,109.25 r90 top
R54 "200 Ohms" "RES 0603_1608" 86.6,108.8 r90 top
R55 "200 Ohms" "RES 0603_1608" 77.6,109.15 r90 top
R56 "200 Ohms" "RES 0603_1608" 67.8,108.9 r90 top
R57 "200 Ohms" "RES 0603_1608" 59.2,108.95 r90 top
R58 "200 Ohms" "RES 0603_1608" 30.05,91.4 r0 top
R59 "200 Ohms" "RES 0603_1608" 27.7,66.7 r270 top
R60 "200 Ohms" "RES 0603_1608" 18.2,4.95 r270 top
R61 "200 Ohms" "RES 0603_1608" 27,5.25 r270 top
R62 "200 Ohms" "RES 0603_1608" 36,5.2 r270 top
R63 "200 Ohms" "RES 0603_1608" 44.6,5.25 r270 top
R64 "200 Ohms" "RES 0603_1608" 53.6,5.25 r270 top
R65 "22 kOhms" "RES 0603_1608" 105.8,14.55 r270 top
R66 "60.4 kOhms" "RES 0603_1608" 106.9,10.65 r90 top
R67 "22 kOhms" "RES 0603_1608" 103.2,14.55 r270 top
R68 "60.4 kOhms" "RES 0603_1608" 104.3,10.65 r90 top
R69 "22 kOhms" "RES 0603_1608" 100.8,14.55 r270 top
R70 "60.4 kOhms" "RES 0603_1608" 101.9,10.65 r90 top
R71 "22 kOhms" "RES 0603_1608" 98.2,14.55 r270 top
R72 "60.4 kOhms" "RES 0603_1608" 99.3,10.65 r90 top
R73 "100 kOhms" "RES 0603_1608" 75.2,17.75 r90 top
R74 "60.4 kOhms" "RES 0603_1608" 74.1,10.75 r270 top
R75 "100 kOhms" "RES 0603_1608" 72.7,17.75 r90 top
R76 "60.4 kOhms" "RES 0603_1608" 71.6,10.75 r270 top
R77 "100 kOhms" "RES 0603_1608" 70.2,17.75 r90 top
R78 "60.4 kOhms" "RES 0603_1608" 69.1,10.75 r270 top
R79 "100 kOhms" "RES 0603_1608" 67.7,17.75 r90 top
R80 "60.4 kOhms" "RES 0603_1608" 66.6,10.75 r270 top
R81 "22 kOhms" "RES 0603_1608" 93.6,17.65 r270 top
R82 "60.4 kOhms" "RES 0603_1608" 92.5,10.75 r90 top
R83 "22 kOhms" "RES 0603_1608" 91.1,17.65 r270 top
R84 "60.4 kOhms" "RES 0603_1608" 90,10.75 r90 top
R85 "22 kOhms" "RES 0603_1608" 88.6,17.65 r270 top
R86 "60.4 kOhms" "RES 0603_1608" 87.5,10.75 r90 top
R87 "22 kOhms" "RES 0603_1608" 86,17.65 r270 top
R88 "60.4 kOhms" "RES 0603_1608" 84.9,10.8 r90 top
R89 "22 kOhms" "RES 0603_1608" 83.4,17.65 r270 top
R90 "60.4 kOhms" "RES 0603_1608" 82.3,10.8 r90 top
R91 "22 kOhms" "RES 0603_1608" 81,17.65 r270 top
R92 "60.4 kOhms" "RES 0603_1608" 79.9,10.8 r90 top
R93 "200 Ohms" "RES 0603_1608" 62.2,5.25 r270 top
R94 "200 Ohms" "RES 0603_1608" 123.1,41.7 r0 top
R95 "200 Ohms" "RES 0603_1608" 123.6,49.6 r0 top
R96 "200 Ohms" "RES 0603_1608" 123.5,57.6 r0 top
R97 "200 Ohms" "RES 0603_1608" 123.408,65.818 r0 top
R98 "200 Ohms" "RES 0603_1608" 123.211,74.095 r0 top
R99 "200 Ohms" "RES 0603_1608" 123.25,82.1 r0 top
SW1 "218-2LPST" "CTS 218-2LPJ" 118.2,19.4 r180 top
U1 "TLV1117LV33DCYR" DCY0004A_N 56.4,27.4 r0 top
U2 "SN65HVD230DR" FP-D0008A-IPC_A 115.386,13.635 r0 top
U3 "SN65HVD230DR" FP-D0008A-IPC_A 115.4,25 r0 top
U4 "AOZ1360AIL" AOZ1360AIL_AOS 117.035,99.139 r90 top
U5 "AOZ1360AIL" AOZ1360AIL_AOS 108.2,99.064 r90 top
U6 "AOZ1360AIL" AOZ1360AIL_AOS 99.7,99.064 r90 top
U7 "AOZ1360AIL" AOZ1360AIL_AOS 91.1,99.064 r90 top
U8 "SN74HC594DR" FP-D0016A-IPC_A 70.135,82.984 r270 top
U9 "AOZ1360AIL" AOZ1360AIL_AOS 82.4,98.964 r90 top
U10 "AOZ1360AIL" AOZ1360AIL_AOS 73.2,98.964 r90 top
U11 "AOZ1360AIL" AOZ1360AIL_AOS 63.705,98.875 r90 top
U12 "AOZ1360AIL" AOZ1360AIL_AOS 55,98.8 r90 top
U13 "INA219AIDCNR" FP-DCN0008A-IPC_B 31.525,87.565 r90 top
U14 "TPL7407LPWR" PW0016A_N 20.8,102.4 r180 top
U15 "INA219AIDCNR" FP-DCN0008A-IPC_B 29.675,62.565 r90 top
U16 "" SIP32510DT-T1-GE3_VIS 13.9,12.864 r90 top
U17 "" SIP32510DT-T1-GE3_VIS 22.85,12.931 r90 top
U18 "SN74HC594DR" FP-D0016A-IPC_A 45.3,28 r90 top
U19 "" SIP32510DT-T1-GE3_VIS 32,12.8 r90 top
U20 "" SIP32510DT-T1-GE3_VIS 40.55,12.866 r90 top
U21 "" SIP32510DT-T1-GE3_VIS 49.3,12.933 r90 top
U22 "" SIP32510DT-T1-GE3_VIS 58.2,12.9 r90 top
U23 "AOZ1360AIL" AOZ1360AIL_AOS 112.475,45.659 r0 top
U24 "AOZ1360AIL" AOZ1360AIL_AOS 112.375,53.559 r0 top
U25 "SN74HC594DR" FP-D0016A-IPC_A 94.184,83.175 r180 top
U26 "AOZ1360AIL" AOZ1360AIL_AOS 112.4,61.564 r0 top
U27 "AOZ1360AIL" AOZ1360AIL_AOS 112.4,69.864 r0 top
U28 "AOZ1360AIL" AOZ1360AIL_AOS 112.3,78.064 r0 top
U29 "AOZ1360AIL" AOZ1360AIL_AOS 112.275,86.059 r0 top
U30 "INA219AIDCNR" FP-DCN0008A-IPC_B 52.375,82.8 r90 top
U31 "INA219AIDCNR" FP-DCN0008A-IPC_B 93.4,73.464 r180 top
U32 "INA219AIDCNR" FP-DCN0008A-IPC_B 8.3,14.4 r0 top
U33 "LM5146QRGYTQ1" FP-RGY0020B-MFG 44.3,66.564 r0 top
U34 "LM5148RGYR" FP-RGY0024F-MFG 22.05,37.114 r0 top
U35 "CD4511BPWR" PW0016A_N 51.2,55.5 r180 top
U36 "CD4511BPWR" PW0016A_N 63.8,52.4 r180 top
U37 "M24C02-WMN6TP" FP-SO8N-SO-A-MFG 100.618,24.232 r180 top
Y1 "8 MHz" "NDK NX3225GD" 72.746,39.888 r270 top

## Footprints (in the part's own frame and the unit in brackets; to place one, negate y for a bottom-side part, rotate by r counter-clockwise, add the part's x,y. Pads: shape width x height; smd on the part's side, far side on the other; paste and mask are expansions set on the pad)
691137710002 [mm] "Horizontal Cable Entry with Pressure Clamp, pitch 5mm, 02p"
  rrect50% 1.95x1.95 hole 1.3: 1(-2.5,0.25)
  round 1.95 hole 1.3: 2(2.5,0.25)
  silkscreen extent -5,-3.75 5,3.75, body extent -5,-3.75 5,3.75, height 11.6
AOZ1360AIL_AOS [mil]
  rect 57.55x22 smd paste+0 mask+0: 1(-107.27,75) 2(-107.27,25) 3(-107.27,-25) 4(-107.27,-75) 5(107.27,-75) 6(107.27,-25) 7(107.27,25) 8(107.27,75)
  silkscreen extent -84,-104 84,104, body extent -122,-99 122,99, height 69
"CAP 0603_1608" [mm] "Chip Capacitor, 2-Leads, Body 1.60x0.80mm, IPC Medium Density"
  rect 0.9x1 smd: 1(-0.675,0) 2(0.675,0)
  silkscreen extent -1.4,-0.7 1.4,0.7, body extent -0.8,-0.41 0.8,0.41, height 0.82
"CAP 0805_2012" [mm] "Chip Capacitor, 2-Leads, Body 2.00x1.20mm, IPC Medium Density"
  rect 1.3x1.4 smd: 1(-0.8,0) 2(0.8,0)
  silkscreen extent -1.7,-0.9 1.7,0.9, body extent -1,-0.64 1,0.64, height 1.26
CAPC1005X55X25LL05T10 [mm] "Chip Capacitor, 2-Leads, Body 1.00x0.50mm, IPC High Density"
  rect 0.56x0.52 smd: 1(-0.39,0) 2(0.39,0)
  body extent -0.53,-0.28 0.53,0.28, height 0.55
CAPC1005X55X25ML05T10 [mm] "Chip Capacitor, 2-Leads, Body 1.00x0.50mm, IPC Low Density"
  rect 0.76x0.72 smd: 1(-0.49,0) 2(0.49,0)
  body extent -0.53,-0.28 0.53,0.27, height 0.55
CAPC1005X55X25NL05T10 [mm] "Chip Capacitor, 2-Leads, Body 1.00x0.50mm, IPC Medium Density"
  rect 0.66x0.62 smd: 1(-0.44,0) 2(0.44,0)
  body extent -0.53,-0.28 0.53,0.27, height 0.55
CAPC1608X90X35LL10T15 [mm] "Chip Capacitor, 2-Leads, Body 1.60x0.80mm, IPC High Density"
  rect 0.75x0.85 smd: 1(-0.625,0) 2(0.625,0)
  body extent -0.85,-0.45 0.85,0.45, height 0.9
"CTS 218-2LPJ" [mm] "DIP, 2 POS, Body 3.71x6.05mm, Pitch 1.27mm, IPC Medium Density"
  oval 1.27x0.76 smd: 1(-2.05,0.635) 2(-2.05,-0.635) 3(2.05,-0.635) 4(2.05,0.635)
  silkscreen extent -3.13,-1.85 2.9,2.52, body extent -3.15,-1.86 3.15,1.85, height 2.71
DCY0004A_N [mm] "SOT223, 4-Leads, Body 6.7x3.7mm, Pitch 2.3mm, IPC Medium Density"
  rrect11% 1.75x0.9 smd: 1(-3.125,2.3) 2(-3.125,0) 3(-3.125,-2.3)
  rrect6% 1.75x3.2 smd: 4(3.125,0)
  silkscreen extent -3.25,-3.35 1.95,3.42, body extent -3.5,-3.25 3.5,3.25, height 1.62
FP-1-1721150-0-MFG [mm]
  rect 2x2 hole 1.3 paste-2539.97 mask+0: 1(-6.2,6)
  round 2 hole 1.3 paste-2539.97 mask+0: 2(6,6) 3(8,0) 4(-6.2,-6) 5(6,-6)
  silkscreen extent -9.85,-8 9.85,8.62, body extent -9.95,-8.1 9.95,8.1, height 0.25
FP-ACSC02-41SURKWA-F01-MFG [mm]
  rect 2.8x0.9 smd paste+0 mask+0: 1(-5,2.88) 2(-5,1.44) 3(-5,0) 4(-5,-1.44) 5(-5,-2.88) 6(5,-2.88) 7(5,-1.44) 8(5,0) 9(5,1.44) 10(5,2.88)
  silkscreen extent -7.1,-3.57 3.22,3.57, body extent -6.5,-3.67 6.5,3.67, height 0.25
FP-C1005-050-0_15-IPC_A [mm]
  rect 0.805x0.76 smd paste+0 mask+0: 1(-0.477,0) 2(0.477,0)
  silkscreen extent -0.88,-0.78 0.88,0.78, body extent -1.08,-0.58 1.08,0.58, height 0.25
FP-CGA2B-IPC_C [mm]
  rect 0.272x0.472 smd paste+0 mask+0: 1(-0.5,0) 2(0.5,0)
  silkscreen extent -0.64,-0.67 0.64,0.67, body extent -0.74,-0.38 0.74,0.38, height 0.25
FP-CGA3E-0_3-0_1-IPC_A [mm]
  rect 0.956x1.206 smd paste+0 mask+0: 1(-1.025,0) 2(1.025,0)
  silkscreen extent -0.25,-0.6 0.25,0.6, body extent -2,-1.1 2,1.1, height 0.25
FP-CRCW0402-e3-MFG [mm]
  rect 0.6x0.6 smd paste+0 mask+0: 1(-0.525,0) 2(0.525,0)
  silkscreen extent -0.53,-0.7 0.53,0.7, body extent -0.92,-0.4 0.92,0.4, height 0.25
FP-CRCW0603-e3-IPC_B [mm]
  rect 0.935x0.962 smd paste+0 mask+0: 1(-0.715,0) 2(0.715,0)
  silkscreen extent -0.75,-0.95 0.75,0.9, body extent -1.43,-0.73 1.43,0.73, height 0.25
FP-CRCW0603-e3-IPC_C [mm]
  rect 0.735x0.862 smd paste+0 mask+0: 1(-0.615,0) 2(0.615,0)
  silkscreen extent -0.75,-0.85 0.75,0.85, body extent -1.08,-0.58 1.08,0.58, height 0.25
FP-CSS2H-2512-MFG [mm]
  rect 1.8x3.4 smd paste+0 mask+0: 1(-2.6,0) 2(2.6,0)
  silkscreen extent -1.33,-1.63 1.33,1.63, body extent -3.6,-1.8 3.6,1.8, height 0.25
FP-D0008A-IPC_A [mm]
  rect 2.469x0.622 smd paste+0 mask+0: 1(-2.414,1.905)
  rrect100% 2.469x0.622 smd paste+0 mask+0: 2(-2.414,0.635) 3(-2.414,-0.635) 4(-2.414,-1.905) 5(2.414,-1.905) 6(2.414,-0.635) 7(2.414,0.635) 8(2.414,1.905)
  silkscreen extent -4.32,-2.45 0.68,2.45, body extent -4.15,-2.95 4.15,2.95, height 0.25
FP-D0016A-IPC_A [mm]
  rect 2.474x0.622 smd paste+0 mask+0: 1(-2.416,4.445)
  rrect100% 2.474x0.622 smd paste+0 mask+0: 2(-2.416,3.175) 3(-2.416,1.905) 4(-2.416,0.635) 5(-2.416,-0.635) 6(-2.416,-1.905) 7(-2.416,-3.175) 8(-2.416,-4.445) 9(2.416,-4.445) 10(2.416,-3.175) 11(2.416,-1.905) 12(2.416,-0.635) 13(2.416,0.635) 14(2.416,1.905) 15(2.416,3.175) 16(2.416,4.445)
  silkscreen extent -4.35,-4.95 0.68,4.95, body extent -4.15,-5.45 4.15,5.45, height 0.25
FP-DCN0008A-IPC_B [mm]
  rect 1.505x0.455 smd paste+0 mask+0: 1(-1.1,0.975)
  rrect100% 1.505x0.455 smd paste+0 mask+0: 2(-1.1,0.325) 3(-1.1,-0.325) 4(-1.1,-0.975) 5(1.1,-0.975) 6(1.1,-0.325) 7(1.1,0.325) 8(1.1,0.975)
  silkscreen extent -2.62,-1.7 1.4,1.7, body extent -2.1,-1.7 2.1,1.7, height 0.25
FP-DNK0008A-MFG [mm]
  rect 1.372x0.71 smd paste-1000 mask+0: 1(-2.77,1.905) 2(-2.77,0.635) 3(-2.77,-0.635) 4(-2.77,-1.905)
  round 3.434 smd paste-1000 mask+0: 5-6-7-8(0.958,-0.318)
  Top Layer region: -0.984,-2.26 3.456,-2.26 3.456,-1.55 2.866,-1.55 2.866,-0.99 3.456,-0.99 3.456,-0.28 2.866,-0.28 2.866,0.28 3.456,0.28 3.456,0.99 2.866,0.99 2.866,1.55 3.456,1.55 3.456,2.26 -0.984,2.26
  silkscreen extent -4.22,-2.65 2.95,2.65, body extent -3.56,-2.65 3.56,2.65, height 0.25
FP-DQJ0008A-MFG [mm]
  rect 0.75x0.675 smd paste-1000 mask+0: 1(-2.752,1.905) 2(-2.752,0.635) 3(-2.752,-0.635) 4(-2.752,-1.905)
  round 3.821 smd paste-1000 mask+0: 5-6-7-8(0.35,-0.07)
  Top Layer region: 3.127,-2.242 3.127,-1.568 2.472,-1.568 2.472,-0.972 3.127,-0.972 3.127,-0.297 2.472,-0.297 2.472,0.298 3.127,0.298 3.127,0.973 2.472,0.973 2.472,1.568 3.127,1.568 3.127,2.243 -1.823,2.242 -1.823,-2.242
  silkscreen extent -3.82,-2.63 2.9,2.63, body extent -3.23,-2.6 3.23,2.6, height 0.25
FP-GRM32-MFG [mm]
  rect 1.1x2.05 smd paste+0 mask+0: 1(-1.65,0) 2(1.65,0)
  silkscreen extent -0.72,-1.35 0.72,1.35, body extent -2.3,-1.45 2.3,1.45, height 0.25
FP-GRM32E-0_3-0_2-IPC_C [mm]
  rect 1.703x2.606 smd paste+0 mask+0: 1(-1.051,0) 2(1.051,0)
  silkscreen extent -1.9,-1.75 1.9,1.75, body extent -2,-1.45 2,1.45, height 0.25
FP-GRM188-0_1-e0_2_0_5-MFG [mm]
  rect 0.65x0.7 smd paste+0 mask+0: 1(-0.675,0) 2(0.675,0)
  silkscreen extent -0.85,-0.75 0.85,0.75, body extent -1.1,-0.55 1.1,0.55, height 0.25
FP-IHLP-2525CZ-FP_2_413x3-MFG [mil]
  rect 95x135 smd paste+0 mask+0: 1(-115,0) 2(115,0)
  silkscreen extent -132,-132 132,132, body extent -166,-136 166,136, height 10
FP-PU2512-0R005-MFG [mm]
  rect 1.8x3.4 smd paste+0 mask+0: 1(-2.6,0) 2(2.6,0)
  silkscreen extent -1.33,-1.72 1.33,1.72, body extent -3.6,-1.82 3.6,1.82, height 0.25
FP-RGY0020B-MFG [mm]
  rrect40% 0.25x0.6 smd paste+0 mask+0: 1(-0.75,2.15) 10(-0.75,-2.15) 11(0.75,-2.15) 20(0.75,2.15)
  rrect40% 0.6x0.25 smd paste+0 mask+0: 2(-1.65,1.75) 3(-1.65,1.25) 4(-1.65,0.75) 5(-1.65,0.25) 6(-1.65,-0.25) 7(-1.65,-0.75) 8(-1.65,-1.25) 9(-1.65,-1.75) 12(1.65,-1.75) 13(1.65,-1.25) 14(1.65,-0.75) 15(1.65,-0.25) 16(1.65,0.25) 17(1.65,0.75) 18(1.65,1.25) 19(1.65,1.75)
  rrect6% 1.7x2.7 smd paste-1000 mask+0: 21(0,0)
  silkscreen extent -1.8,-2.3 1.8,3.15, body extent -2.05,-2.55 2.05,2.55, height 0.25
FP-RGY0024F-MFG [mm]
  rrect40% 0.25x0.6 smd paste+0 mask+0: 1(-0.75,2.65) 12(-0.75,-2.65) 13(0.75,-2.65) 24(0.75,2.65)
  rrect40% 0.6x0.25 smd paste+0 mask+0: 2(-1.65,2.25) 3(-1.65,1.75) 4(-1.65,1.25) 5(-1.65,0.75) 6(-1.65,0.25) 7(-1.65,-0.25) 8(-1.65,-0.75) 9(-1.65,-1.25) 10(-1.65,-1.75) 11(-1.65,-2.25) 14(1.65,-2.25) 15(1.65,-1.75) 16(1.65,-1.25) 17(1.65,-0.75) 18(1.65,-0.25) 19(1.65,0.25) 20(1.65,0.75) 21(1.65,1.25) 22(1.65,1.75) 23(1.65,2.25)
  rrect5% 2.1x4.1 smd paste-1000 mask+0: 25(0,0)
  silkscreen extent -1.8,-2.8 1.8,3.62, body extent -2.05,-3.05 2.05,3.05, height 0.25
FP-SO8N-SO-A-MFG [mm]
  rect 1.4x0.6 smd paste+0 mask+0: 1(-2.65,1.905) 2(-2.65,0.635) 3(-2.65,-0.635) 4(-2.65,-1.905) 5(2.65,-1.905) 6(2.65,-0.635) 7(2.65,0.635) 8(2.65,1.905)
  silkscreen extent -4.03,-2.5 1.5,2.5, body extent -3.45,-2.6 3.45,2.6, height 0.25
FUSE_3587-10TR [mm]
  rect 1.57x2.82 smd: 1_1(-6.73,3.16) 1_2(-6.73,-3.16) 2_1(6.73,3.16) 2_2(6.73,-3.16)
  silkscreen extent -9.9,-3.36 9.9,3.36
IND_XAL1580-302MED_COC [mil]
  rect 122x492 smd paste+0 mask+0: 1(-210.5,0) 2(210.5,0)
  silkscreen extent -308,-328 308,328, body extent -303,-323 303,323, height 32
"LED 0603_1608 RED" [mm] "Chip Diode, 2-Leads, Body 1.60x0.80mm, IPC Medium Density"
  rect 0.8x0.8 smd: 1(-0.75,0) 2(0.75,0)
  silkscreen extent -1.52,-0.7 1.52,0.7, body extent -0.8,-0.4 0.8,0.4, height 0.53
"LED 0805_2012 BLUE" [mm] "Chip Diode, 2-Leads, Body 2.00x1.25mm, IPC Medium Density"
  rect 1.2x1.2 smd: 1(-1.05,0) 2(1.05,0)
  silkscreen extent -2.03,-0.9 2.03,0.9, body extent -1,-0.62 1,0.63, height 0.9
"LED 0805_2012 GREEN" [mm] "Chip Diode, 2-Leads, Body 2.00x1.25mm, IPC Medium Density"
  rect 1.2x1.2 smd: 1(-1.05,0) 2(1.05,0)
  silkscreen extent -2.03,-0.9 2.03,0.9, body extent -1,-0.62 1,0.63, height 0.9
"LED 0805_2012 RED" [mm] "Chip Diode, 2-Leads, Body 2.00x1.25mm, IPC Medium Density"
  rect 1.2x1.2 smd: 1(-1.05,0) 2(1.05,0)
  silkscreen extent -2.03,-0.9 2.03,0.9, body extent -1,-0.62 1,0.63, height 0.9
"LED 0805_2012 YELLOW" [mm] "Chip Diode, 2-Leads, Body 2.00x1.25mm, IPC Medium Density"
  rect 1.2x1.2 smd: 1(-1.05,0) 2(1.05,0)
  silkscreen extent -2.03,-0.9 2.03,0.9, body extent -1,-0.62 1,0.63, height 0.9
"MOLEX KK 0022272021" [mm]
  oval 2x3 hole 1.2: 1(-1.27,0) 2(1.27,0)
  silkscreen extent -2.54,-2.79 2.54,2.79, body extent -2.54,-2.9 2.54,2.9, height 11.7
"MOLEX KK 0022272031" [mm]
  oval 2x3 hole 1.2: 1(-2.54,0) 2(0,0) 3(2.54,0)
  silkscreen extent -3.81,-2.79 3.81,2.79, body extent -3.81,-2.9 3.81,2.9, height 11.7
"MOLEX KK 0022272041" [mm]
  oval 2x3 hole 1.2: 1(-3.81,0) 2(-1.27,0) 3(1.27,0) 4(3.81,0)
  silkscreen extent -5.08,-2.79 5.08,2.79, body extent -5.08,-2.9 5.08,2.9, height 11.7
"NDK NX3225GD" [mm] "Crystal, 2-Leads, Body 2.50x3.20mm"
  rect 1.5x2.7 smd: 1(-0.95,0) 2(0.95,0)
  silkscreen extent -2.15,-1.75 2,1.6, body extent -1.6,-1.25 1.6,1.25, height 1
PW0016A_N [mm] "SOP, 16-Leads, Body 5.1x4.5mm, Pitch 0.65mm, IPC Medium Density"
  rrect22% 1.4x0.45 smd: 1(-2.95,2.275) 2(-2.95,1.625) 3(-2.95,0.975) 4(-2.95,0.325) 5(-2.95,-0.325) 6(-2.95,-0.975) 7(-2.95,-1.625) 8(-2.95,-2.275) 9(2.95,-2.275) 10(2.95,-1.625) 11(2.95,-0.975) 12(2.95,-0.325) 13(2.95,0.325) 14(2.95,0.975) 15(2.95,1.625) 16(2.95,2.275)
  silkscreen extent -3.08,-2.55 1.85,3.17, body extent -3.21,-2.5 3.21,2.5, height 1
"RES 0402_1005" [mm] "Chip Resistor, 2-Leads, Body 1.0x0.5mm, IPC Medium Density"
  rect 0.75x0.6 smd: 1(-0.575,0) 2(0.575,0)
  silkscreen extent -1.14,-0.51 1.14,0.51, body extent -0.5,-0.25 0.5,0.25, height 0.35
"RES 0603_1608" [mm] "Chip Resistor, 2-Leads, Body 1.60x0.80mm, IPC Medium Density"
  rect 0.85x0.95 smd: 1(-0.65,0) 2(0.65,0)
  silkscreen extent -1.27,-0.7 1.27,0.7, body extent -0.8,-0.4 0.8,0.4, height 0.45
"RES 0805_2012" [mm] "Chip Resistor, 2-Leads, Body 2.00x1.25mm, IPC Medium Density"
  rect 1.15x1.35 smd: 1(-0.875,0) 2(0.875,0)
  silkscreen extent -1.7,-0.9 1.7,0.9, body extent -1,-0.62 1,0.63, height 0.6
RESC1005X40X25LL05T05 [mm] "Chip Resistor, 2-Leads, Body 1.00x0.50mm, IPC High Density"
  rect 0.45x0.45 smd: 1(-0.4,0) 2(0.4,0)
  body extent -0.53,-0.27 0.53,0.28, height 0.4
"RESNET 1206-8 CONVEX" [mm] "4 resistor 3.20x1.60mm, 0.7mm high"
  rect 0.9x0.45 smd: 1(-0.85,1.2) 2(-0.85,0.4) 3(-0.85,-0.4) 4(-0.85,-1.2) 5(0.85,-1.2) 6(0.85,-0.4) 7(0.85,0.4) 8(0.85,1.2)
  silkscreen extent -1.6,-1.73 1.6,1.73, body extent -0.84,-1.62 0.84,1.63, height 0.71
"RESNET 1506-16 CONVEX" [mm] "Array Chip Resistor, 16 leads, 8 resistors, Body 3.8x1.6mm Height 0.55mm"
  rect 0.5x0.425 smd mask+0.032: 1(-0.75,1.837) 8(-0.75,-1.837) 9(0.75,-1.837) 16(0.75,1.837)
  rect 0.5x0.25 smd mask+0.032: 2(-0.75,1.25) 4(-0.75,0.25) 5(-0.75,-0.25) 6(-0.75,-0.75) 7(-0.75,-1.25) 10(0.75,-1.25) 11(0.75,-0.75) 12(0.75,-0.25) 13(0.75,0.25) 15(0.75,1.25)
  rect 0.5x0.25 smd paste+0 mask+0.032: 3(-0.75,0.75) 14(0.75,0.75)
  silkscreen extent -1.2,-2.3 1.2,2.3, body extent -0.83,-1.95 0.82,1.95, height 0.51
SIP32510DT-T1-GE3_VIS [mil]
  rect 40x20 smd paste+0 mask+0: 1(-52.5,37.4) 2(-52.5,0) 3(-52.5,-37.4) 4(52.5,-37.4) 5(52.5,0) 6(52.5,37.4)
  silkscreen extent -38,-63 38,63, body extent -59,-58 59,58, height 43
"ST LQFP-100 14X14MM" [mm] "Thin QFP, 100-Leads, Body 14x14mm, Pitch 0.5mm, ST Recommended"
  oval 1.2x0.3 smd: 1(-7.75,6) 2(-7.75,5.5) 3(-7.75,5) 4(-7.75,4.5) 5(-7.75,4) 6(-7.75,3.5) 7(-7.75,3) 8(-7.75,2.5) 9(-7.75,2) 10(-7.75,1.5) 11(-7.75,1) 12(-7.75,0.5) 13(-7.75,0) 14(-7.75,-0.5) 15(-7.75,-1) 16(-7.75,-1.5) 17(-7.75,-2) 18(-7.75,-2.5) 19(-7.75,-3) 20(-7.75,-3.5) 21(-7.75,-4) 22(-7.75,-4.5) 23(-7.75,-5) 24(-7.75,-5.5) 25(-7.75,-6) 51(7.75,-6) 52(7.75,-5.5) 53(7.75,-5) 54(7.75,-4.5) 55(7.75,-4) 56(7.75,-3.5) 57(7.75,-3) 58(7.75,-2.5) 59(7.75,-2) 60(7.75,-1.5) 61(7.75,-1) 62(7.75,-0.5) 63(7.75,0) 64(7.75,0.5) 65(7.75,1) 66(7.75,1.5) 67(7.75,2) 68(7.75,2.5) 69(7.75,3) 70(7.75,3.5) 71(7.75,4) 72(7.75,4.5) 73(7.75,5) 74(7.75,5.5) 75(7.75,6)
  oval 0.3x1.2 smd: 26(-6,-7.75) 27(-5.5,-7.75) 28(-5,-7.75) 29(-4.5,-7.75) 30(-4,-7.75) 31(-3.5,-7.75) 32(-3,-7.75) 33(-2.5,-7.75) 34(-2,-7.75) 35(-1.5,-7.75) 36(-1,-7.75) 37(-0.5,-7.75) 38(0,-7.75) 39(0.5,-7.75) 40(1,-7.75) 41(1.5,-7.75) 42(2,-7.75) 43(2.5,-7.75) 44(3,-7.75) 45(3.5,-7.75) 46(4,-7.75) 47(4.5,-7.75) 48(5,-7.75) 49(5.5,-7.75) 50(6,-7.75) 76(6,7.75) 77(5.5,7.75) 78(5,7.75) 79(4.5,7.75) 80(4,7.75) 81(3.5,7.75) 82(3,7.75) 83(2.5,7.75) 84(2,7.75) 85(1.5,7.75) 86(1,7.75) 87(0.5,7.75) 88(0,7.75) 89(-0.5,7.75) 90(-1,7.75) 91(-1.5,7.75) 92(-2,7.75) 93(-2.5,7.75) 94(-3,7.75) 95(-3.5,7.75) 96(-4,7.75) 97(-4.5,7.75) 98(-5,7.75) 99(-5.5,7.75) 100(-6,7.75)
  silkscreen extent -7.87,-6.75 6.75,6.82, body extent -8.01,-8.01 8.01,8.01, height 1.63
"TE 282834-2" [mm]
  oval 1.75x2.5 hole 1.1: 1(-1.27,0) 2(1.27,0)
  silkscreen extent -2.7,-3.2 2.7,3.2, body extent -2.77,-3.25 2.77,3.25, height 10
"TE 282834-4" [mm]
  oval 1.75x2.5 hole 1.1: 1(-3.81,0) 2(-1.27,0) 3(1.27,0) 4(3.81,0)
  silkscreen extent -5.24,-3.2 5.24,3.2, body extent -5.31,-3.25 5.31,3.25, height 10
"TE 282834-6" [mm]
  oval 1.75x2.5 hole 1.1: 1(-6.35,0) 2(-3.81,0) 3(-1.27,0) 4(1.27,0) 5(3.81,0) 6(6.35,0)
  silkscreen extent -7.78,-3.2 7.78,3.2, body extent -7.85,-3.25 7.85,3.25, height 10
TRANS_CSD18540Q5B [mm]
  rect 1.372x0.71 smd paste-2: 1(-2.77,1.905) 2(-2.77,0.635) 3(-2.77,-0.635) 4(-2.77,-1.905)
  rect 1.372x0.71 smd paste-2 mask+0: 5(2.77,-1.905) 6(2.77,-0.635) 7(2.77,0.635) 8(2.77,1.905)
  Top Layer region: 2.866,-2.26 -0.984,-2.26 -0.984,2.26 2.866,2.26
  silkscreen extent -4.23,-2.5 -1.3,2.5, body extent -3,-2.5 3,2.5, height 1.05

## Part data
C1 C2 C3 C4 C5 C6 C7 C8 C12 C13 C14 C34 C78 C79 C80 C81 C82 C83 C84 C85 C86 C87: library part 6R3X14W104MV4T, "CAP CER 0.1UF 6.3V X7R 0603", Device Package="0603 (1608 Metric)", manufacturer="Johanson Dielectrics Inc.", Operating Temperature="-55°C ~ 125°C", Supplier Part Number 1=709-1009-1-ND, Temperature Coefficient=X7R, Tolerance=±20%, Voltage - Rated=6.3V, Applications="Bypass, Decoupling", Capacitance="0.1 µF", componentlink1description=Datasheet, componentlink1url=https://www.johansondielectrics.com/downloads/x2y-filter-and-decoupling-capacitors.pdf, componentlink2description="DigiKey Link", componentlink2url=https://www.digikey.com/en/products/detail/johanson-dielectrics-inc/6R3X14W104MV4T/1556331, Features="Low ESL (X2Y)", lastupdated="1/24/2024 8:09:44 PM", Lifecycle Status=Active, Minimum Order=1, Mounting Type="Surface Mount, MLCC", Package / Case="0603 (1608 Metric)", packaging=TapeAndReel, Part Number=6R3X14W104MV4T, Part Status=Active, partid=2650, price=0.08, series=X2Y®, Size / Dimension="0.064\" L x 0.035\" W (1.63mm x 0.89mm)", Supplier 1=DigiKey, Thickness (Max)="0.026\" (0.66mm)"
C9: library part 0603DD106MAT2A, "CAP CER 10UF 35V X5R 0603", Device Package="0603 (1608 Metric)", manufacturer="KYOCERA AVX", Operating Temperature="-55°C ~ 85°C", Supplier Part Number 1=478-0603DD106MAT2ACT-ND, Temperature Coefficient=X5R, Tolerance=±20%, Voltage - Rated=35V, Applications="General Purpose", Capacitance="10 µF", componentlink2description="DigiKey Link", componentlink2url=https://www.digikey.com/en/products/detail/kyocera-avx/0603DD106MAT2A/16602926, lastupdated="1/24/2024 8:09:02 PM", Lifecycle Status=Active, Minimum Order=1, Mounting Type="Surface Mount, MLCC", Package / Case="0603 (1608 Metric)", packaging=TapeAndReel, Part Number=0603DD106MAT2A, Part Status=Active, partid=46895, price=0.05, series=-, Size / Dimension="0.063\" L x 0.031\" W (1.60mm x 0.80mm)", Supplier 1=DigiKey
C10 C11: library part 0603X475K6R3CT, "CAP CER 4.7UF 6.3V X5R 0603", Device Package="0603 (1608 Metric)", manufacturer="Walsin Technology Corporation", Operating Temperature="-55°C ~ 85°C", Supplier Part Number 1=1292-0603X475K6R3CT-ND, Temperature Coefficient=X5R, Tolerance=±10%, Voltage - Rated=6.3V, Applications="General Purpose", Capacitance="4.7 µF", componentlink1description=Datasheet, componentlink1url=https://www.passivecomponent.com/wp-content/uploads/datasheet/WTC_MLCC_General_Purpose.pdf, componentlink2description="DigiKey Link", componentlink2url=https://www.digikey.com/en/products/detail/walsin-technology-corporation/0603X475K6R3CT/6707555, lastupdated="1/24/2024 8:09:06 PM", Lifecycle Status=Active, Minimum Order=1, Mounting Type="Surface Mount, MLCC", Package / Case="0603 (1608 Metric)", packaging=TapeAndReel, Part Number=0603X475K6R3CT, Part Status=Active, partid=41179, price=0.04, series=-, Size / Dimension="0.063\" L x 0.032\" W (1.60mm x 0.80mm)", Supplier 1=DigiKey, Thickness (Max)="0.039\" (1.00mm)"
C15 C16: library part 251R14S0R8BV4T, "CAP CER 0.8PF 250V C0G/NP0 0603", Device Package="0603 (1608 Metric)", manufacturer="Johanson Technology Inc.", Operating Temperature="-55°C ~ 125°C", Supplier Part Number 1=712-1305-1-ND, Temperature Coefficient="C0G, NP0", Tolerance=±0.1pF, Voltage - Rated=250V, Applications="RF, Microwave, High Frequency", Capacitance="0.8 pF", componentlink1description=Datasheet, componentlink1url=https://www.johansontechnology.com/downloads/catalog/johanson-technology-multi-layer-high-q-capacitors.pdf, componentlink2description="DigiKey Link", componentlink2url=https://www.digikey.com/en/products/detail/johanson-technology-inc/251R14S0R8BV4T/1561573, Features="High Q, Low Loss, Ultra Low ESR", lastupdated="1/24/2024 8:09:42 PM", Lifecycle Status=Active, Minimum Order=1, Mounting Type="Surface Mount, MLCC", Package / Case="0603 (1608 Metric)", packaging=TapeAndReel, Part Number=251R14S0R8BV4T, Part Status=Active, partid=4851, price=0.03, series=S, Size / Dimension="0.062\" L x 0.032\" W (1.57mm x 0.81mm)", Supplier 1=DigiKey, Thickness (Max)="0.035\" (0.89mm)"
C17 C18 C19 C20 C21 C22 C23 C24 C25 C26 C27 C28 C33 C35 C48 C49 C50 C51 C52 C53 C54 C55 C56 C57 C58 C59: library part GCJ21BR71H105KA01L, "CAP CER 1UF 50V X7R 0805", Device Package="0805 (2012 Metric)", manufacturer="Murata Electronics", Operating Temperature="-55°C ~ 125°C", Ratings=AEC-Q200, Supplier Part Number 1=490-10667-1-ND, Temperature Coefficient=X7R, Tolerance=±10%, Voltage - Rated=50V, Applications="Automotive, Boardflex Sensitive", Capacitance="1 µF", componentlink1description=Datasheet, componentlink1url=https://www.murata.com/~/media/webrenewal/support/library/catalog/products/capacitor/mlcc/c03e.ashx?la=en-us, componentlink2description="DigiKey Link", componentlink2url=https://www.digikey.com/en/products/detail/murata-electronics/GCJ21BR71H105KA01L/4903512, Features="Soft Termination", lastupdated="12/20/2023 8:14:07 PM", Lifecycle Status=Active, Minimum Order=1, Mounting Type="Surface Mount, MLCC", Package / Case="0805 (2012 Metric)", packaging=TapeAndReel, Part Number=GCJ21BR71H105KA01L, Part Status=Active, partid=2709, price=0.05, series=GCJ, Size / Dimension="0.079\" L x 0.049\" W (2.00mm x 1.25mm)", Supplier 1=DigiKey, Thickness (Max)="0.057\" (1.45mm)"
C29 C30 C31 C32 C46: library part 08051Z105KAT2A, "0805 X7S 1UF10% 100V", Device Package="0805 (2012 Metric)", manufacturer="KYOCERA AVX", Operating Temperature="-55°C ~ 125°C", Supplier Part Number 1=478-08051Z105KAT2ACT-ND, Temperature Coefficient=X7S, Tolerance=±10%, Voltage - Rated=100V, Applications="General Purpose", Capacitance="1 µF", componentlink1description=Datasheet, componentlink1url=https://datasheets.kyocera-avx.com/X7S.pdf, componentlink2description="DigiKey Link", componentlink2url=https://www.digikey.com/en/products/detail/kyocera-avx/08051Z105KAT2A/17866368, lastupdated="2/1/2024 8:13:20 PM", Lifecycle Status=Active, Minimum Order=1, Mounting Type="Surface Mount, MLCC", Package / Case="0805 (2012 Metric)", packaging=TapeAndReel, Part Number=08051Z105KAT2A, Part Status=Active, partid=54857, price=0.08, series=-, Size / Dimension="0.079\" L x 0.049\" W (2.01mm x 1.25mm)", Supplier 1=DigiKey
C36 C37 C38 C39 C40 C41 C42 C43 C44 C45 C47: library part 0805B105K500CT, "CAP CER 1UF 50V X7R 0805", Device Package="0805 (2012 Metric)", manufacturer="Walsin Technology Corporation", Operating Temperature="-55°C ~ 125°C", Supplier Part Number 1=1292-0805B105K500CT-ND, Temperature Coefficient=X7R, Tolerance=±10%, Voltage - Rated=50V, Applications="General Purpose", Capacitance="1 µF", componentlink1description=Datasheet, componentlink1url=https://www.passivecomponent.com/wp-content/uploads/datasheet/WTC_MLCC_General_Purpose.pdf, componentlink2description="DigiKey Link", componentlink2url=https://www.digikey.com/en/products/detail/walsin-technology-corporation/0805B105K500CT/14836864, lastupdated="12/20/2023 8:12:21 PM", Lifecycle Status=Active, Minimum Order=1, Mounting Type="Surface Mount, MLCC", Package / Case="0805 (2012 Metric)", packaging=TapeAndReel, Part Number=0805B105K500CT, Part Status=Active, partid=41252, price=0.05, series=-, Size / Dimension="0.079\" L x 0.049\" W (2.00mm x 1.25mm)", Supplier 1=DigiKey, Thickness (Max)="0.057\" (1.45mm)"
C60 C61 C62: library part CS0603KRX7R7BB104, "CAP CER 0.1UF 16V X7R 0603", Part Number=CS0603KRX7R7BB104
C63: library part CMP-2000-07546-2, "Cap Ceramic 100nF 50V X7R 10% Pad SMD 0603 +125°C Automotive T/R", Capacitance=100nF, Case Code (Imperial)=0603, Case Code (Metric)=1608, Dielectric=X7R, Max Operating Temperature=125°C, Min Operating Temperature=-55°C, Package Quantity=1, Ratings=AEC-Q200, Tolerance=10%, Voltage=50V, Case/Package=0603, Composition=Ceramic, Depth=0.8mm, Height=0.8mm, Lead Free="Lead Free", Length=1.6mm, Mount="Surface Mount", packaging="Tape and Reel", Radiation Hardening=No, REACH SVHC="No SVHC", Termination=SMD/SMT, Thickness=0.035inch, Voltage Rating=50V, Voltage Rating (DC)=50V, Weight=7.1E-05oz, Width=0.8mm
C64: library part CMP-1038-02162-3, "CAP CER 4.7UF 50V X7R 1210", Capacitance=4.7uF, manufacturer=Murata, Package=GRM32, Temperature="-55°C to +125°C", Temperature Characteristic=X7R, Temperature Coefficient=15%, Temperature Range High=+125°C, Temperature Range Low=-55°C, Tolerance=10%, Voltage Rating=50V, Automotive=No, Category=Cap, componentlink2description=Datasheet, componentlink2url=https://search.murata.co.jp/Ceramy/image/img/A01X/G101/ENG/GRM32ER71H475KA88-01A.pdf, Device Class L1="Passive Components", Device Class L2=Capacitors, Device Class L3="Ceramic Capacitors", Digikey Description="CAP CER 4.7UF 50V X7R 1210", Height=2.7mm, Lead Free=Yes, Manufacturer Part Number=GRM32ER71H475KA88L, Material=Ceramic, Mouser Description="Capacitor Capacitance tolerance: ±10% Ceramic type: X7R Construction form: 1210 Capacitance: 4.7 µF Rated voltage: 50...", Octopart=https://octopart.com/grm32er71h475ka88l-murata-196576, RoHS=TRUE
C65 C66 C67: library part CMP-2000-05458-2, "CAP CER 22UF 25V X5R 1210", Capacitance=22uF, manufacturer="Murata Electronics North America", Operating Temperature="-55°C ~ 85°C", Package=GRM32, Package / Case="1210 (3225 Metric)", Standard Package=1,000, Temperature="-55°C to +85°C", Temperature Characteristic=X5R, Temperature Range High=+85°C, Temperature Range Low=-55°C, Tolerance=10%, Voltage - Rated=25V, Applications="General Purpose", Automotive=No, Category=Cap, componentlink2description=Datasheet, componentlink2url=https://search.murata.co.jp/Ceramy/image/img/A01X/G101/ENG/GRM32ER61E226KE15-01A.pdf, Device Class L1="Passive Components", Device Class L2=Capacitors, Device Class L3="Ceramic Capacitors", Digikey Description="CAP CER 22UF 25V X5R 1210", Height=2.7mm, Lead Free=Yes, Manufacturer Part Number=GRM32ER61E226KE15L, Material=Ceramic, Mounting Type="Surface Mount, MLCC", Mouser Description="Multilayer Ceramic Capacitors MLCC - SMD/SMT 1210 22uF 25volts X5R 10%", Octopart=https://octopart.com/grm32er61e226ke15l-murata-197441, Other Names=490-3889-2, packaging="Cut Tape (CT)", Possible Substitute=GRM32ER61E226KE15K, RoHS=TRUE, Size / Dimension="0.126\" L x 0.098\" W (3.20mm x 2.50mm)", Temperature Coefficient=X5R, Thickness (Max)="0.106\" (2.70mm)", Voltage Rating=25V
C68: library part CMP-1035-00565-2, manufacturer=Murata, Part Number=GRM1885C2A100JA01D
C69: library part CMP-2008-04664-1, manufacturer=Murata, Part Number=GRM155R71H561KA01D
C70: library part CMP-08246-007153-1, "CAP CER 2.2UF 35V X5R 0402", Capacitance=2.2uF, Case Code (Imperial)=0402, Case Code (Metric)=1005, Dielectric=X5R, Dielectric Material=Ceramic, Max Operating Temperature=85°C, Min Operating Temperature=-55°C, Package Quantity=1, Tolerance=10%, Voltage Rating=35V, Case/Package=0402, Depth=0.5mm, Height=0.5mm, Lead Free="Lead Free", Length=1mm, Mount="Surface Mount", packaging="Tape and Reel", REACH SVHC="No SVHC", Resistor Type=Ceramic, RoHS Compliant=Yes, series=C, Termination=SMD/SMT, Thickness=0.022inch, Voltage Rating (DC)=35V, Weight=2.3E-05oz, Width=0.5mm
C71: library part CMP-2008-04611-1, manufacturer=Murata, Part Number=GRM155R71C563KA88D
C72: library part CMP-2008-03950-1, manufacturer=Murata, Part Number=GRM155R71C822KA01D
C73: library part CMP-08246-001669-1, "Cap Ceramic 680pF 50V X7R 10% Pad SMD 0402 +125°C Automotive T/R", Capacitance=680pF, Case Code (Imperial)=0402, Case Code (Metric)=1005, Dielectric=X7R, Max Operating Temperature=125°C, Min Operating Temperature=-55°C, Package Quantity=1, Ratings=AEC-Q200, Tolerance=10%, Voltage Rating=50V, Case/Package=0402, Composition=Ceramic, Depth=0.5mm, Height=0.5mm, Length=1mm, Mount="Surface Mount", packaging="Tape and Reel", REACH SVHC="No SVHC", Termination=SMD/SMT, Thickness=0.022inch, Voltage Rating (DC)=50V, Weight=2.3E-05oz, Width=0.02inch
C74 C75: library part CMP-2000-06331-1, "Chip Capacitor, 0.1 uF, +/- 10%, 10 V, -55 to 125 degC, 0402 (1005 Metric), RoHS, Tape and Reel", Capacitance=100000pF, Case Size/Dimension=0402, Dielectric=X7R, manufacturer=Murata, Package Description="2-Pin Surface Mount Device, Body 1 x 0.5 mm", Rated Voltage=10V, Tolerance (%)=±10%, Datasheet URL=http://search.murata.co.jp/Ceramy/image/img/A01X/G101/ENG/GRM155R71A104KA01-01.pdf, Datasheet Version=02/2016, Manufacturer URL=http://www.murata.com/, Mounting Technology=SurfaceMount, Package Reference=0402
C76: library part CMP-2006-02836-2, "Chip Multilayer Ceramic Capacitors for General Purpose, 0603, 2.2uF, X7R, 15%, 10%, 10V", Capacitance=2.2uF, Case Code (Imperial)=0603, Case Code (Metric)=1608, Dielectric=X7R, Max Operating Temperature=125°C, Min Operating Temperature=-55°C, Package Quantity=1, Tolerance=10%, Voltage=10V, Case/Package=0603, Depth=0.8mm, Height=0.8mm, Lead Free="Lead Free", Length=1.6mm, Material=Ceramic, Mount="Surface Mount", Number of Pins=2, packaging="Cut Tape", REACH SVHC="No SVHC", Termination=SMD/SMT, Thickness=0.035inch, Voltage Rating=10V, Voltage Rating (DC)=10V, Weight=7.1E-05oz, Width=0.031inch